# Altium PCB DAP-PCB-REV-3.2.PcbDoc (part 1 of 5)
Units mm, origin at the board's own origin, x right, y up, seen from the top; angles counter-clockwise.
Board outline 54.75 x 54.75 mm, 6 copper layers (L1 (SIG/PWR), L2 (GND), L3 (SIG), L4 (PWR), L5 (GND), L6 (SIG/PWR)), stack 1.65 mm thick; 308 components, 179 nets, 954 pads, 440 vias.
Unrouted connection lines stored in the file: 7.
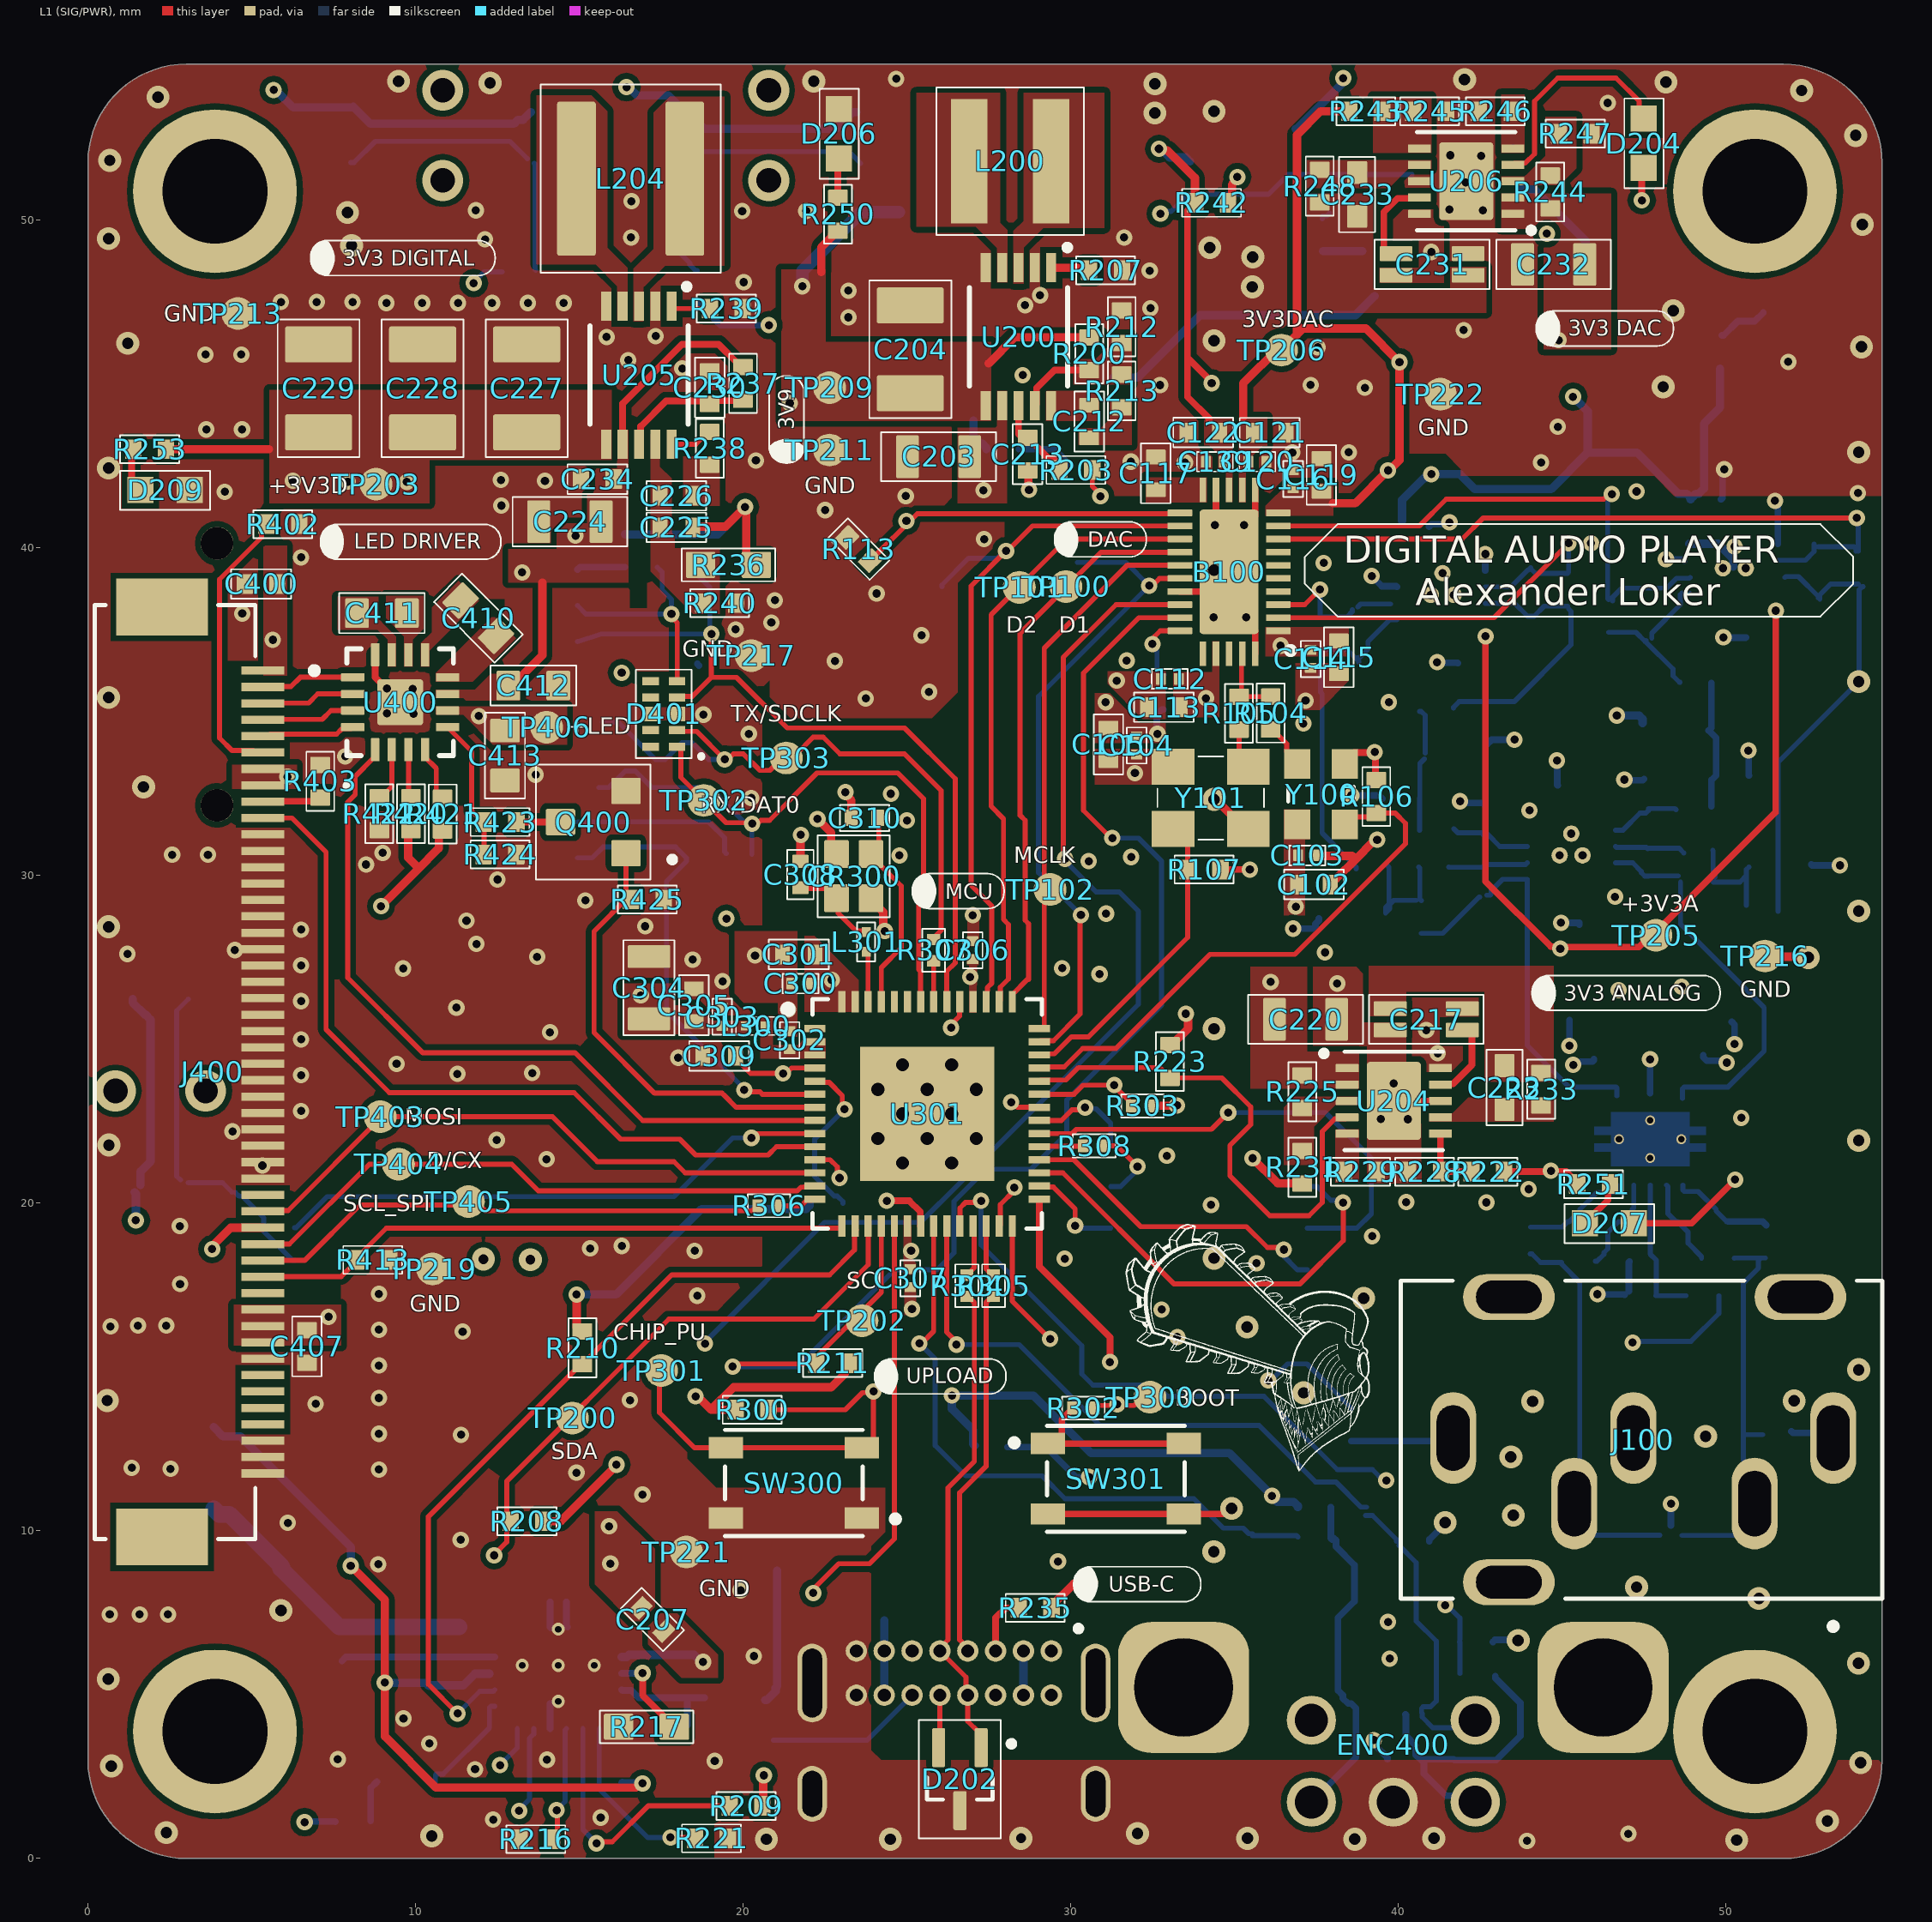
[diagram p0: L1 (SIG/PWR) view]
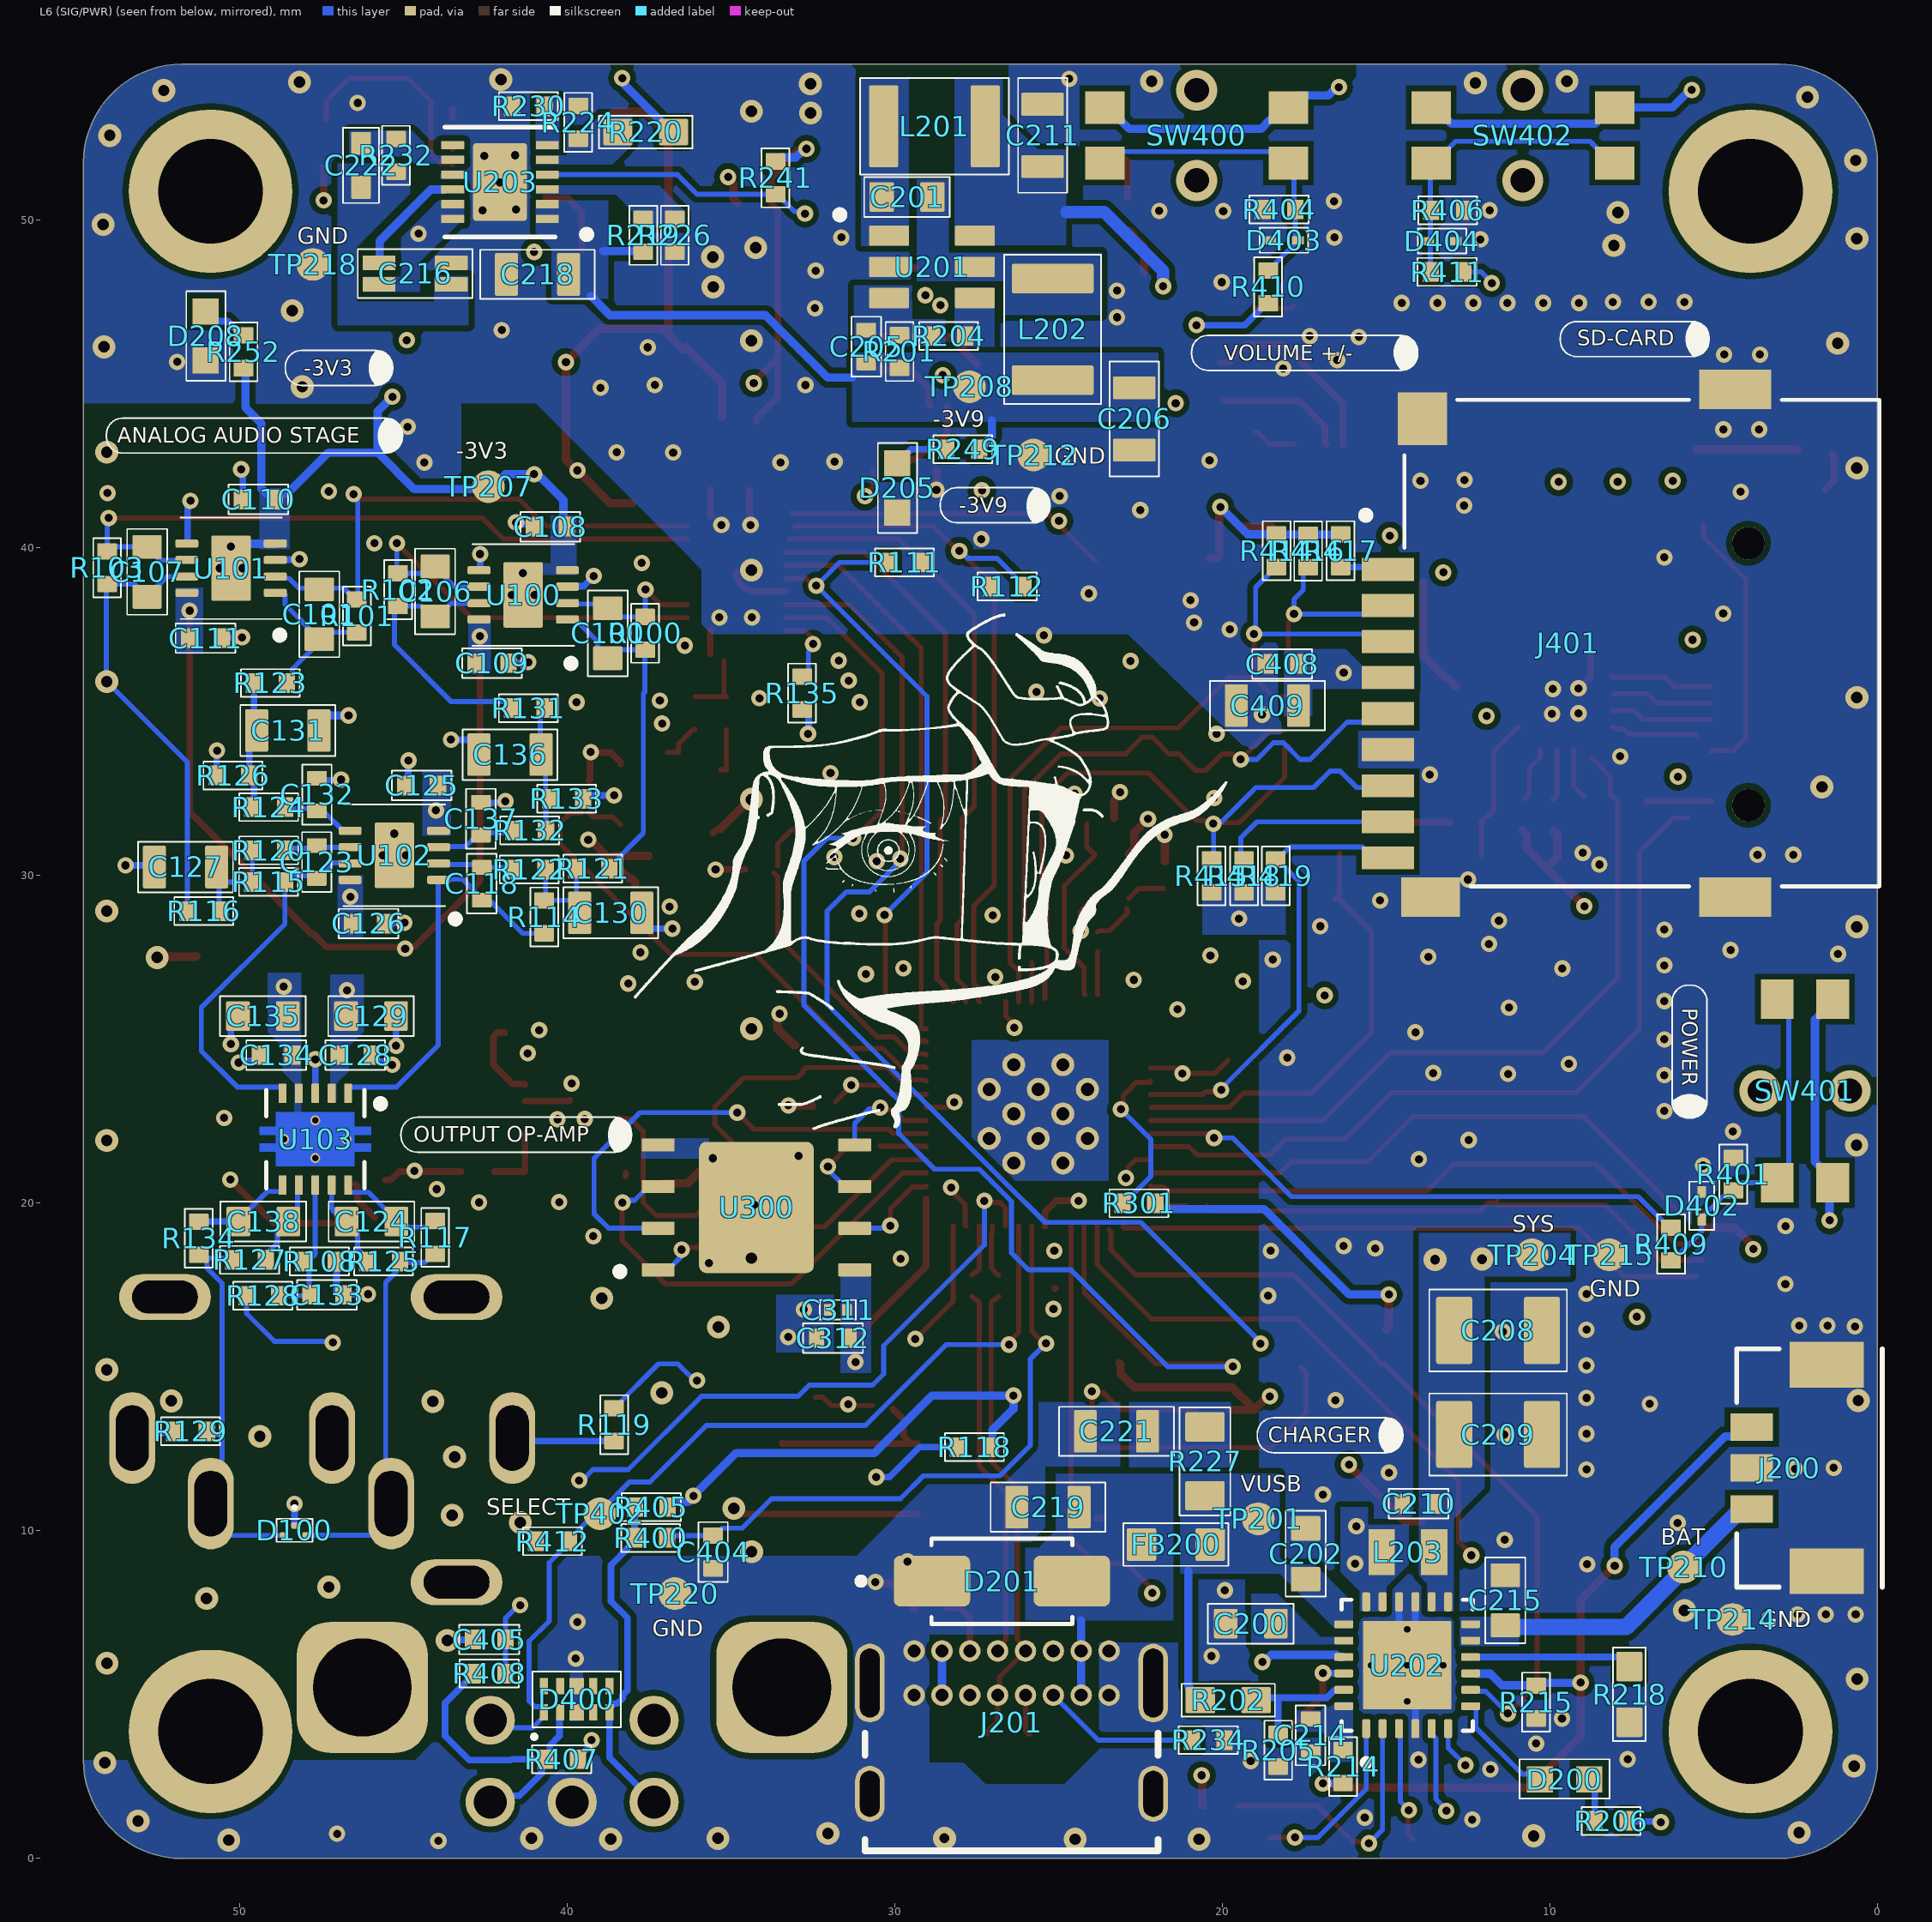
[diagram p1: L6 (SIG/PWR) view, seen from below]
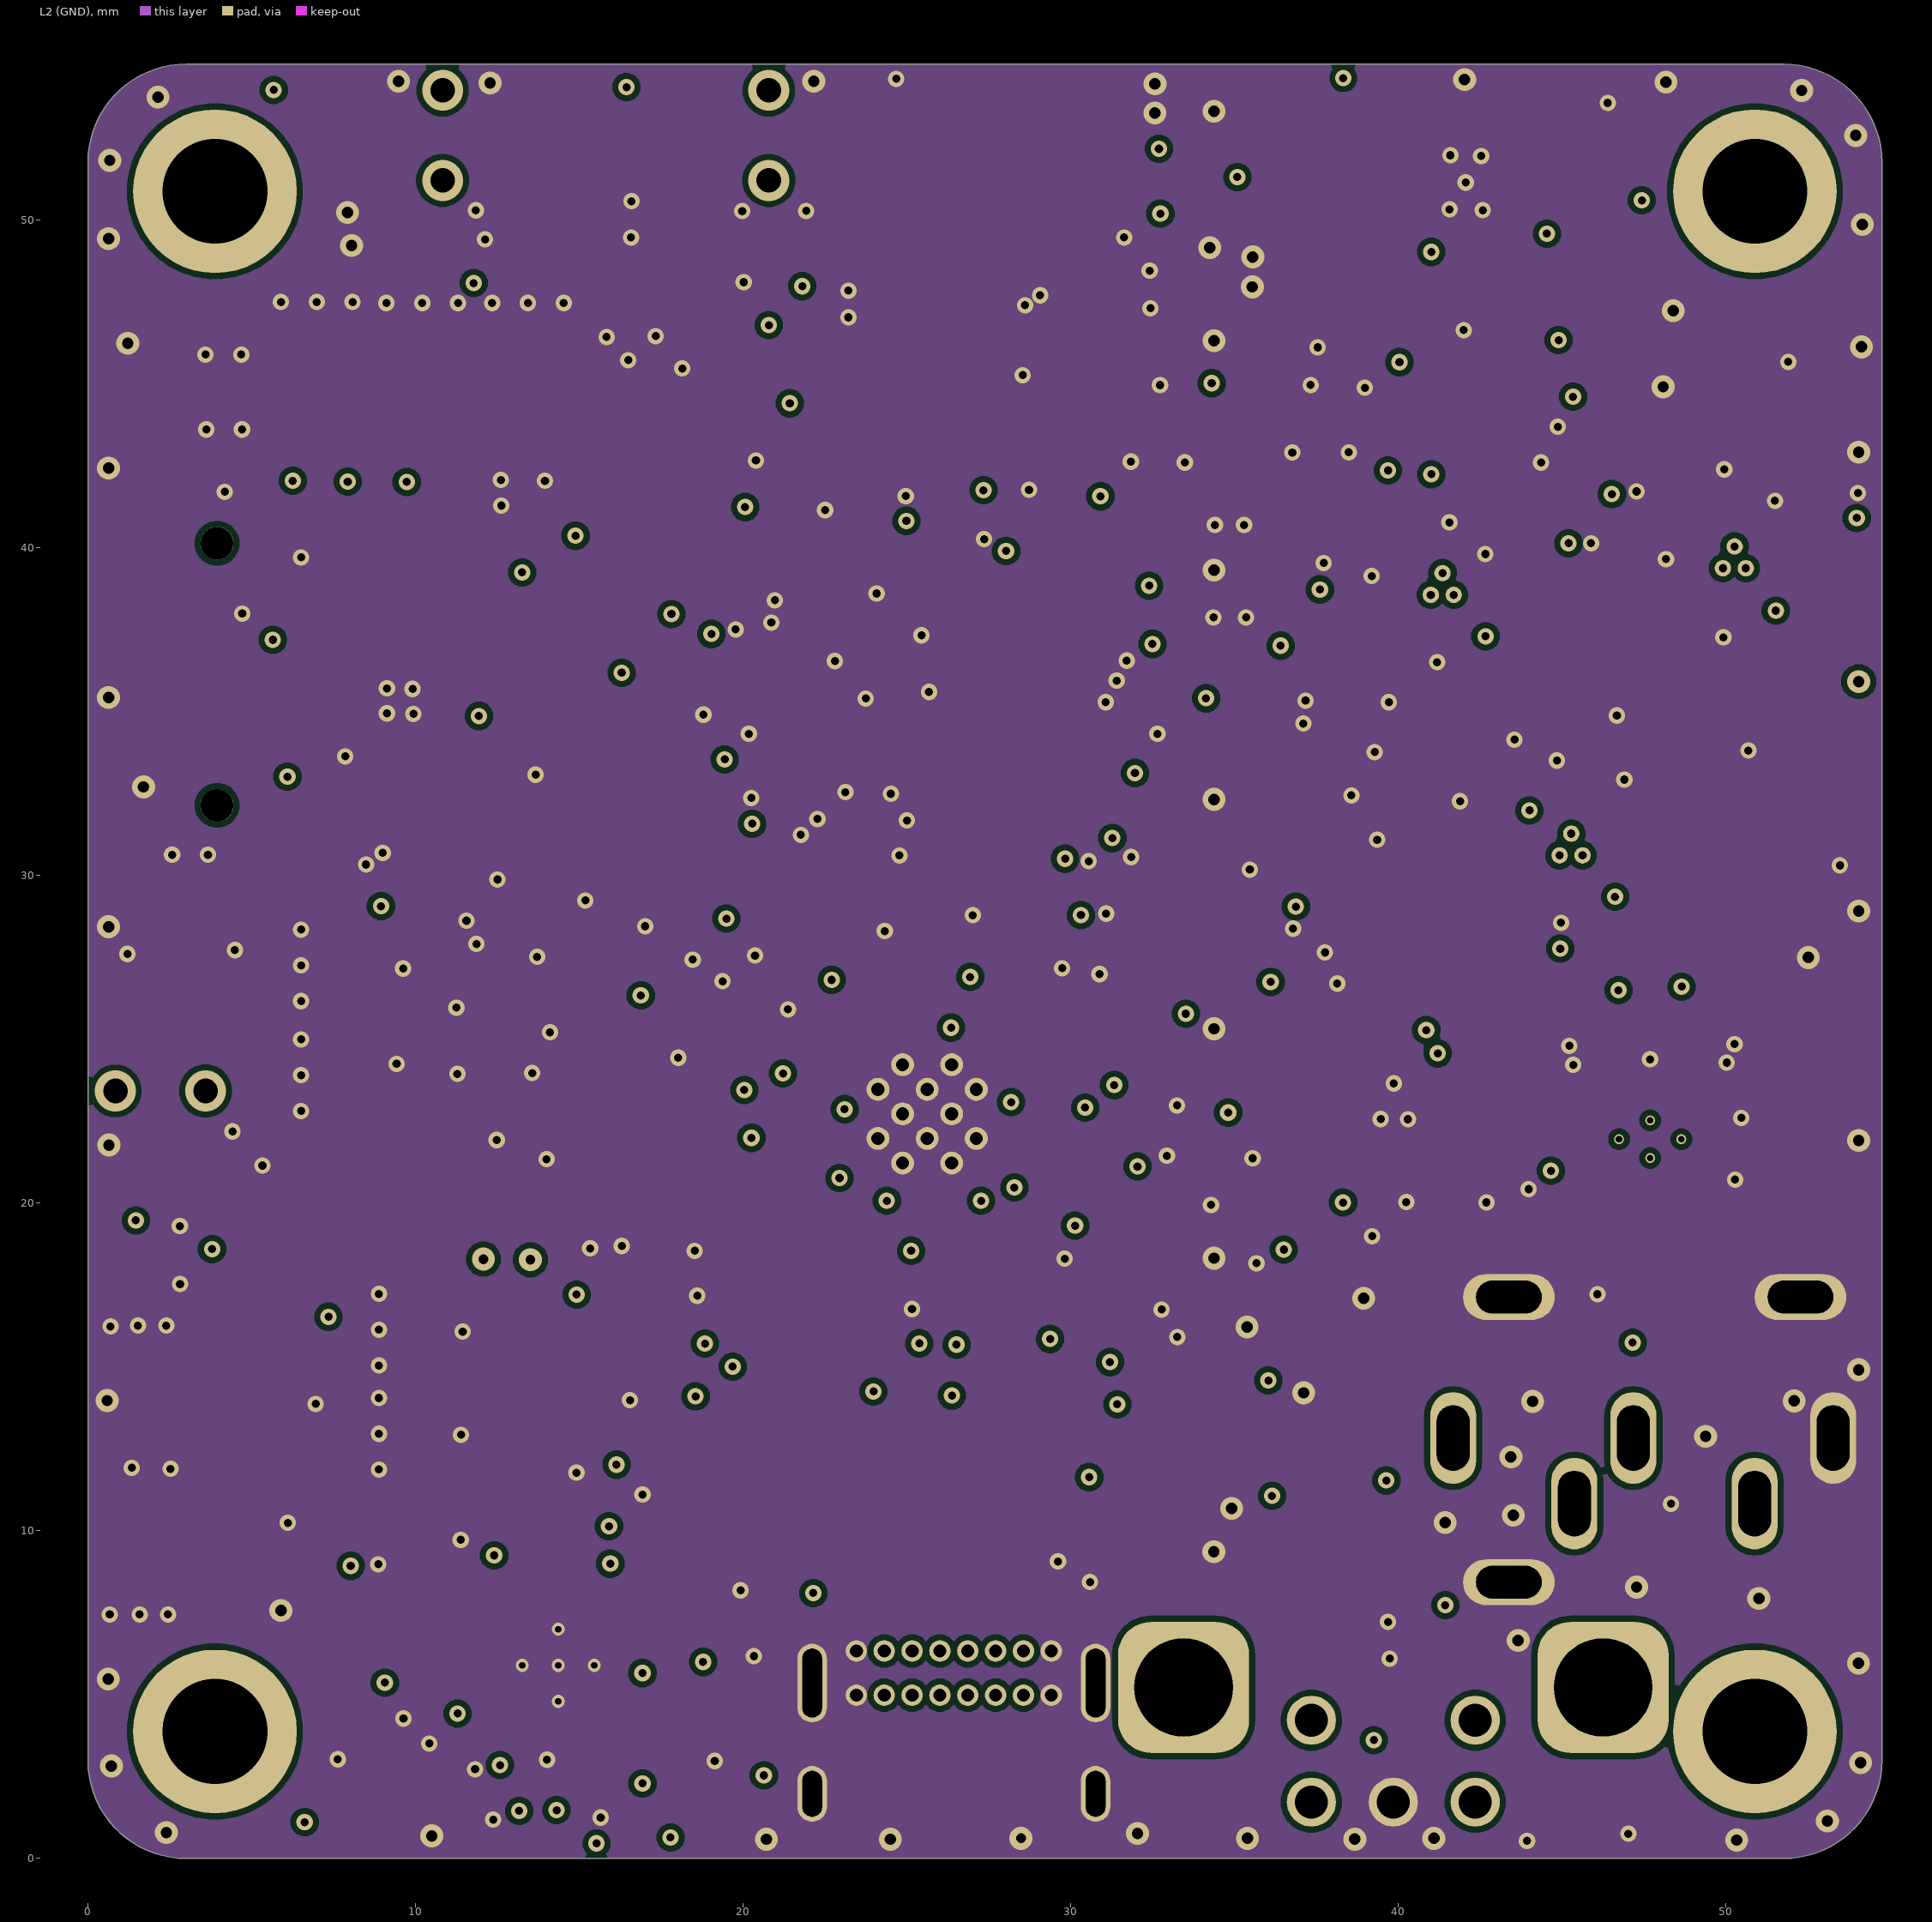
[diagram p2: L2 (GND)]
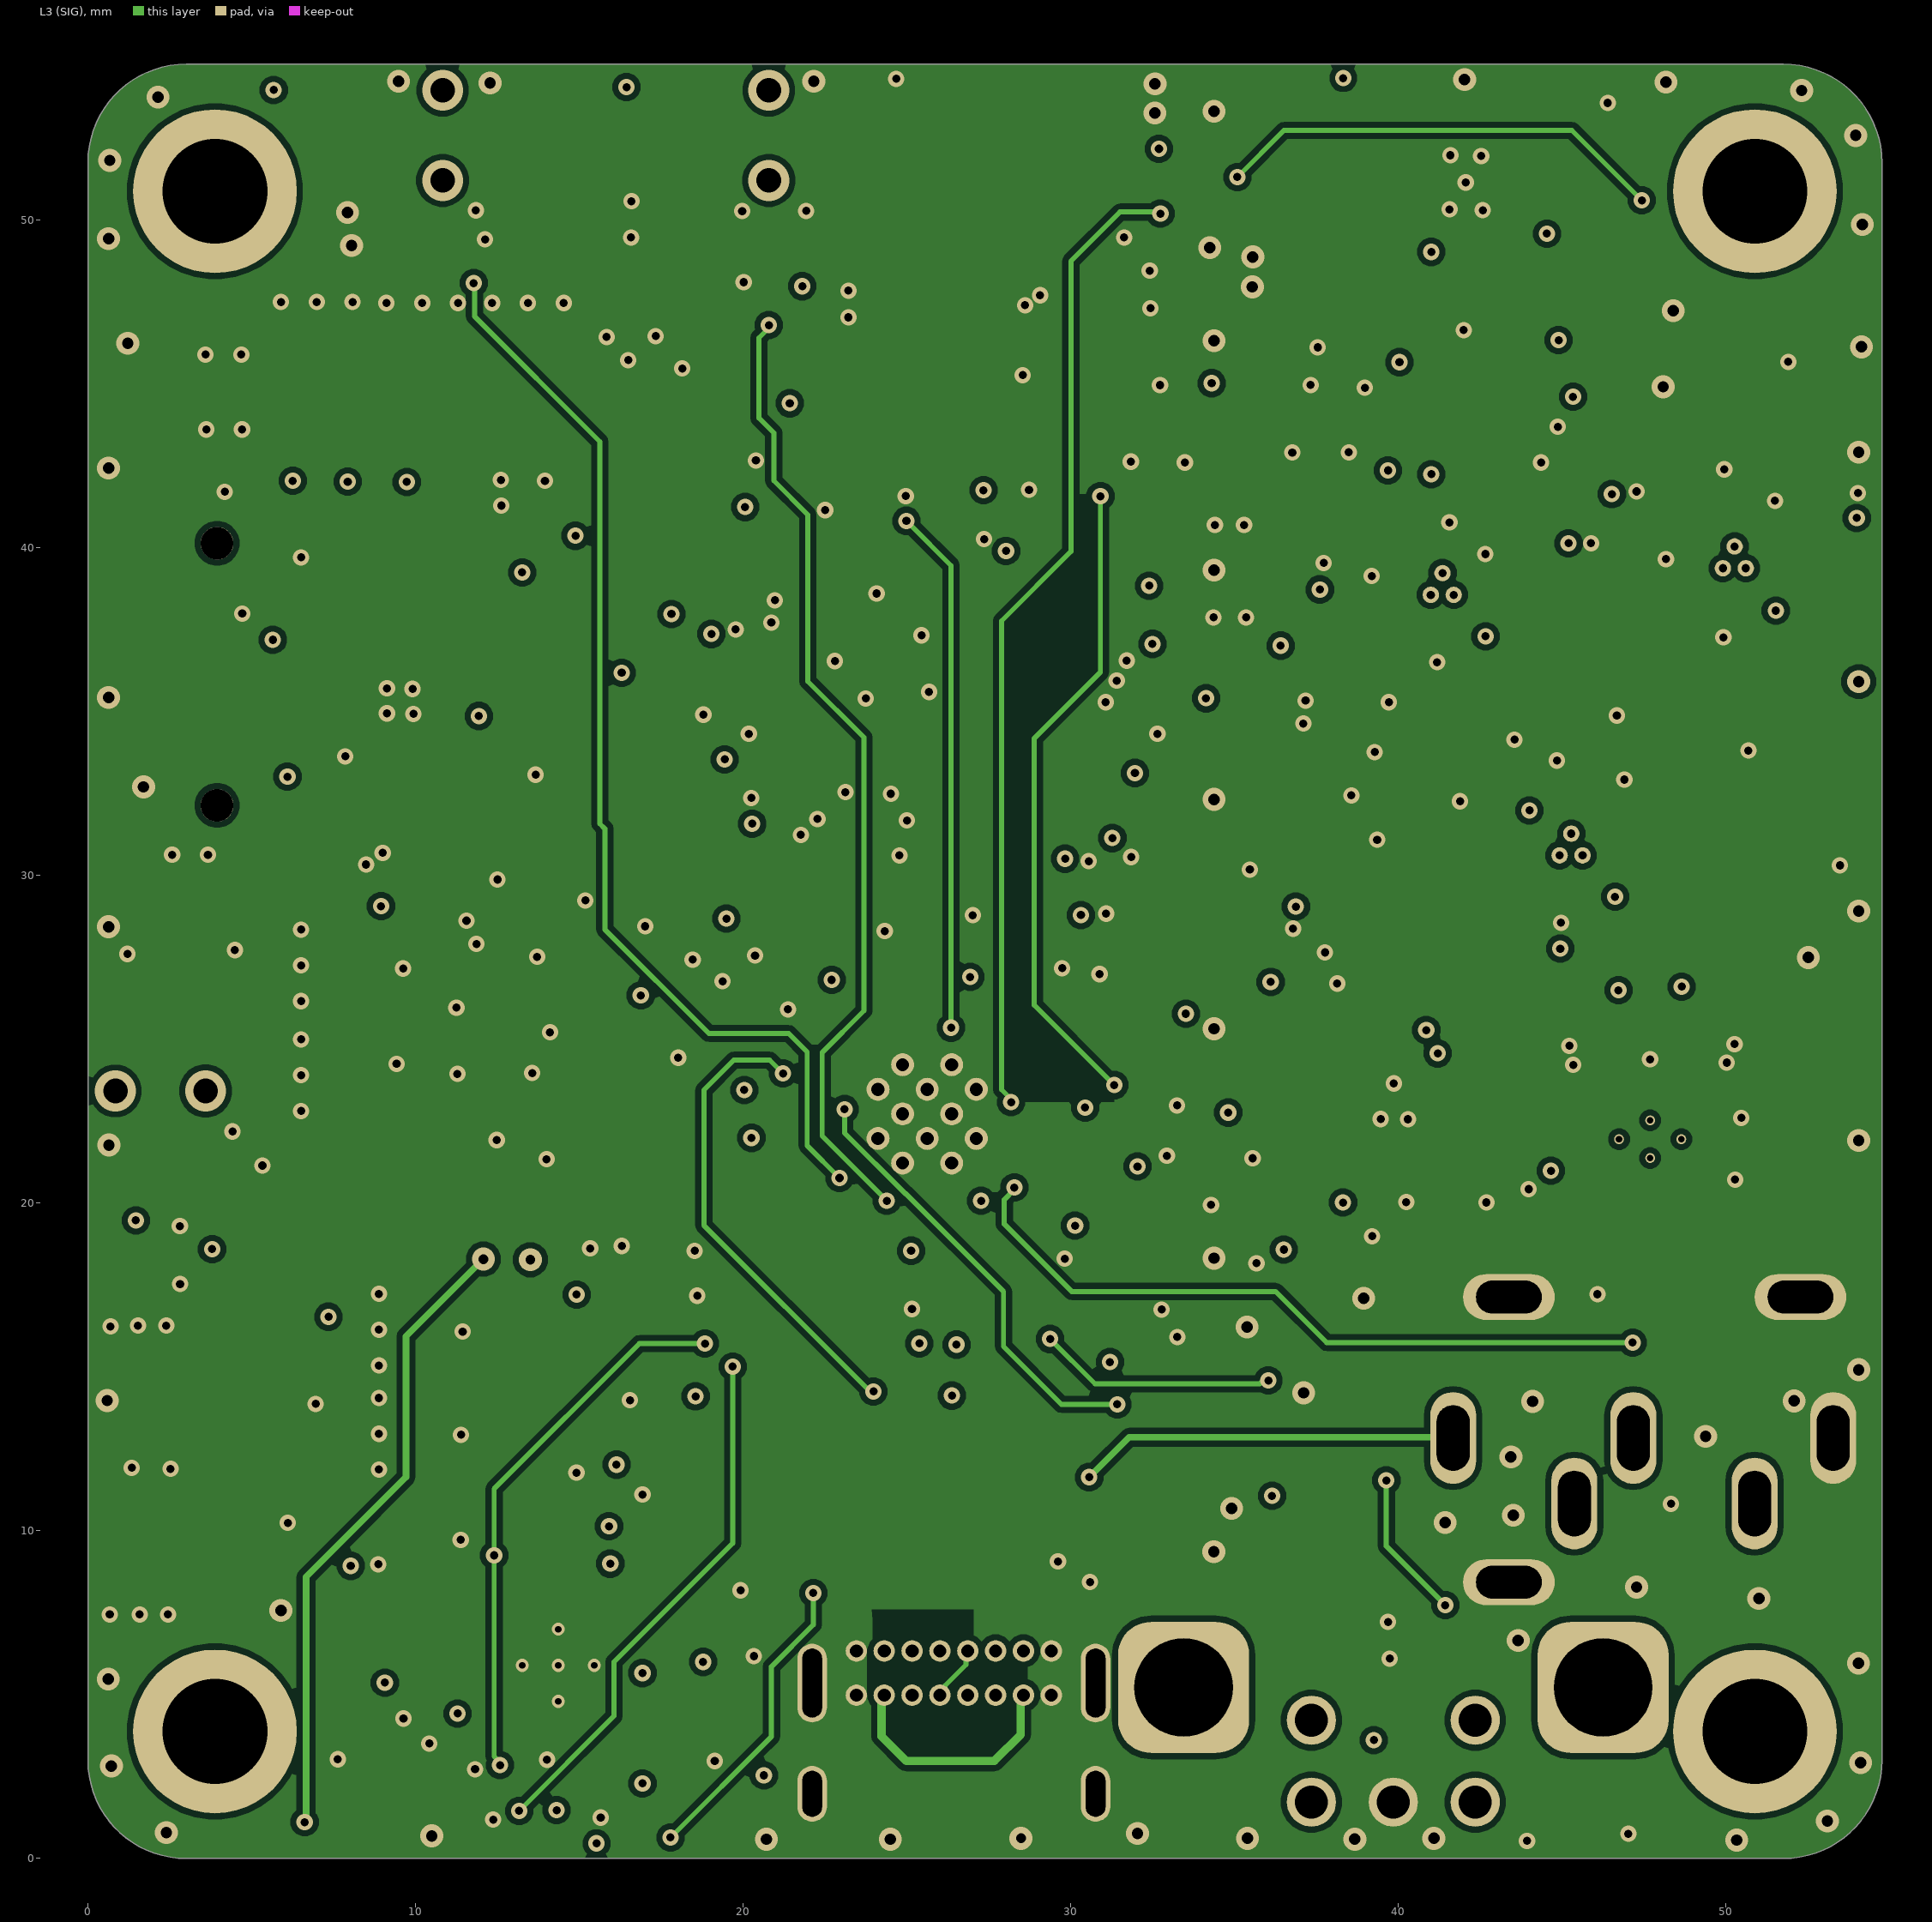
[diagram p3: L3 (SIG)]
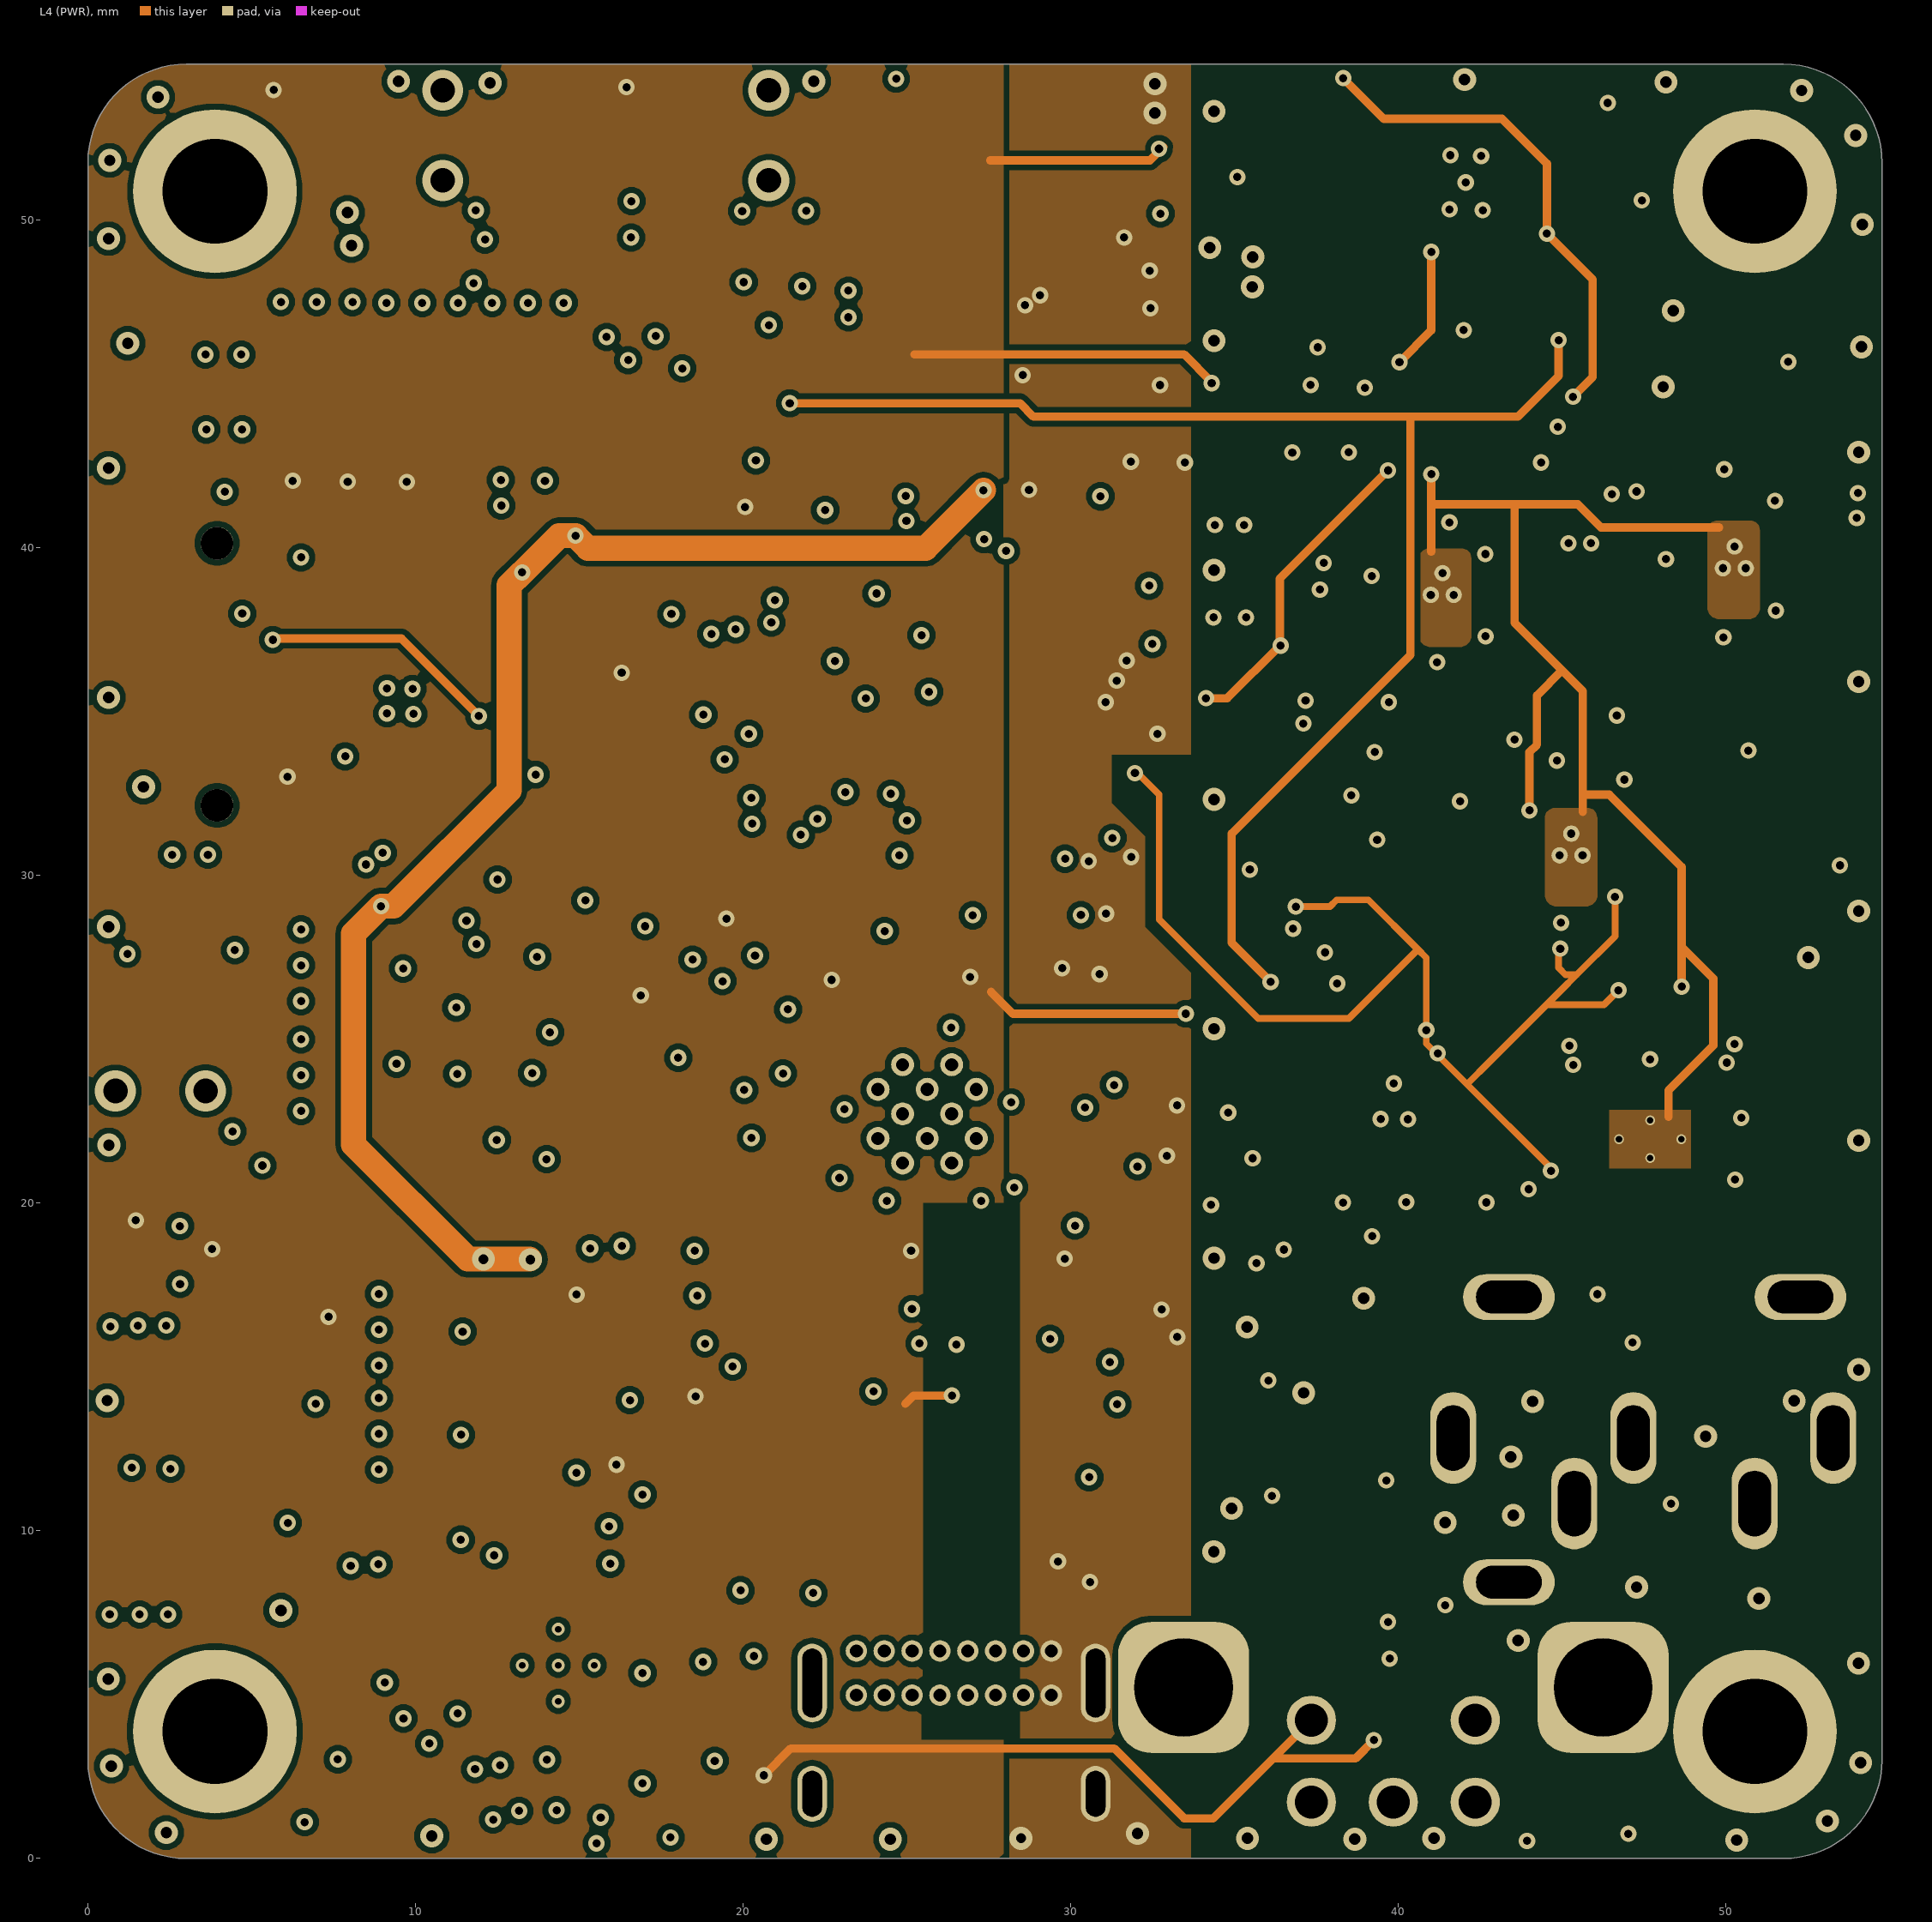
[diagram p4: L4 (PWR)]
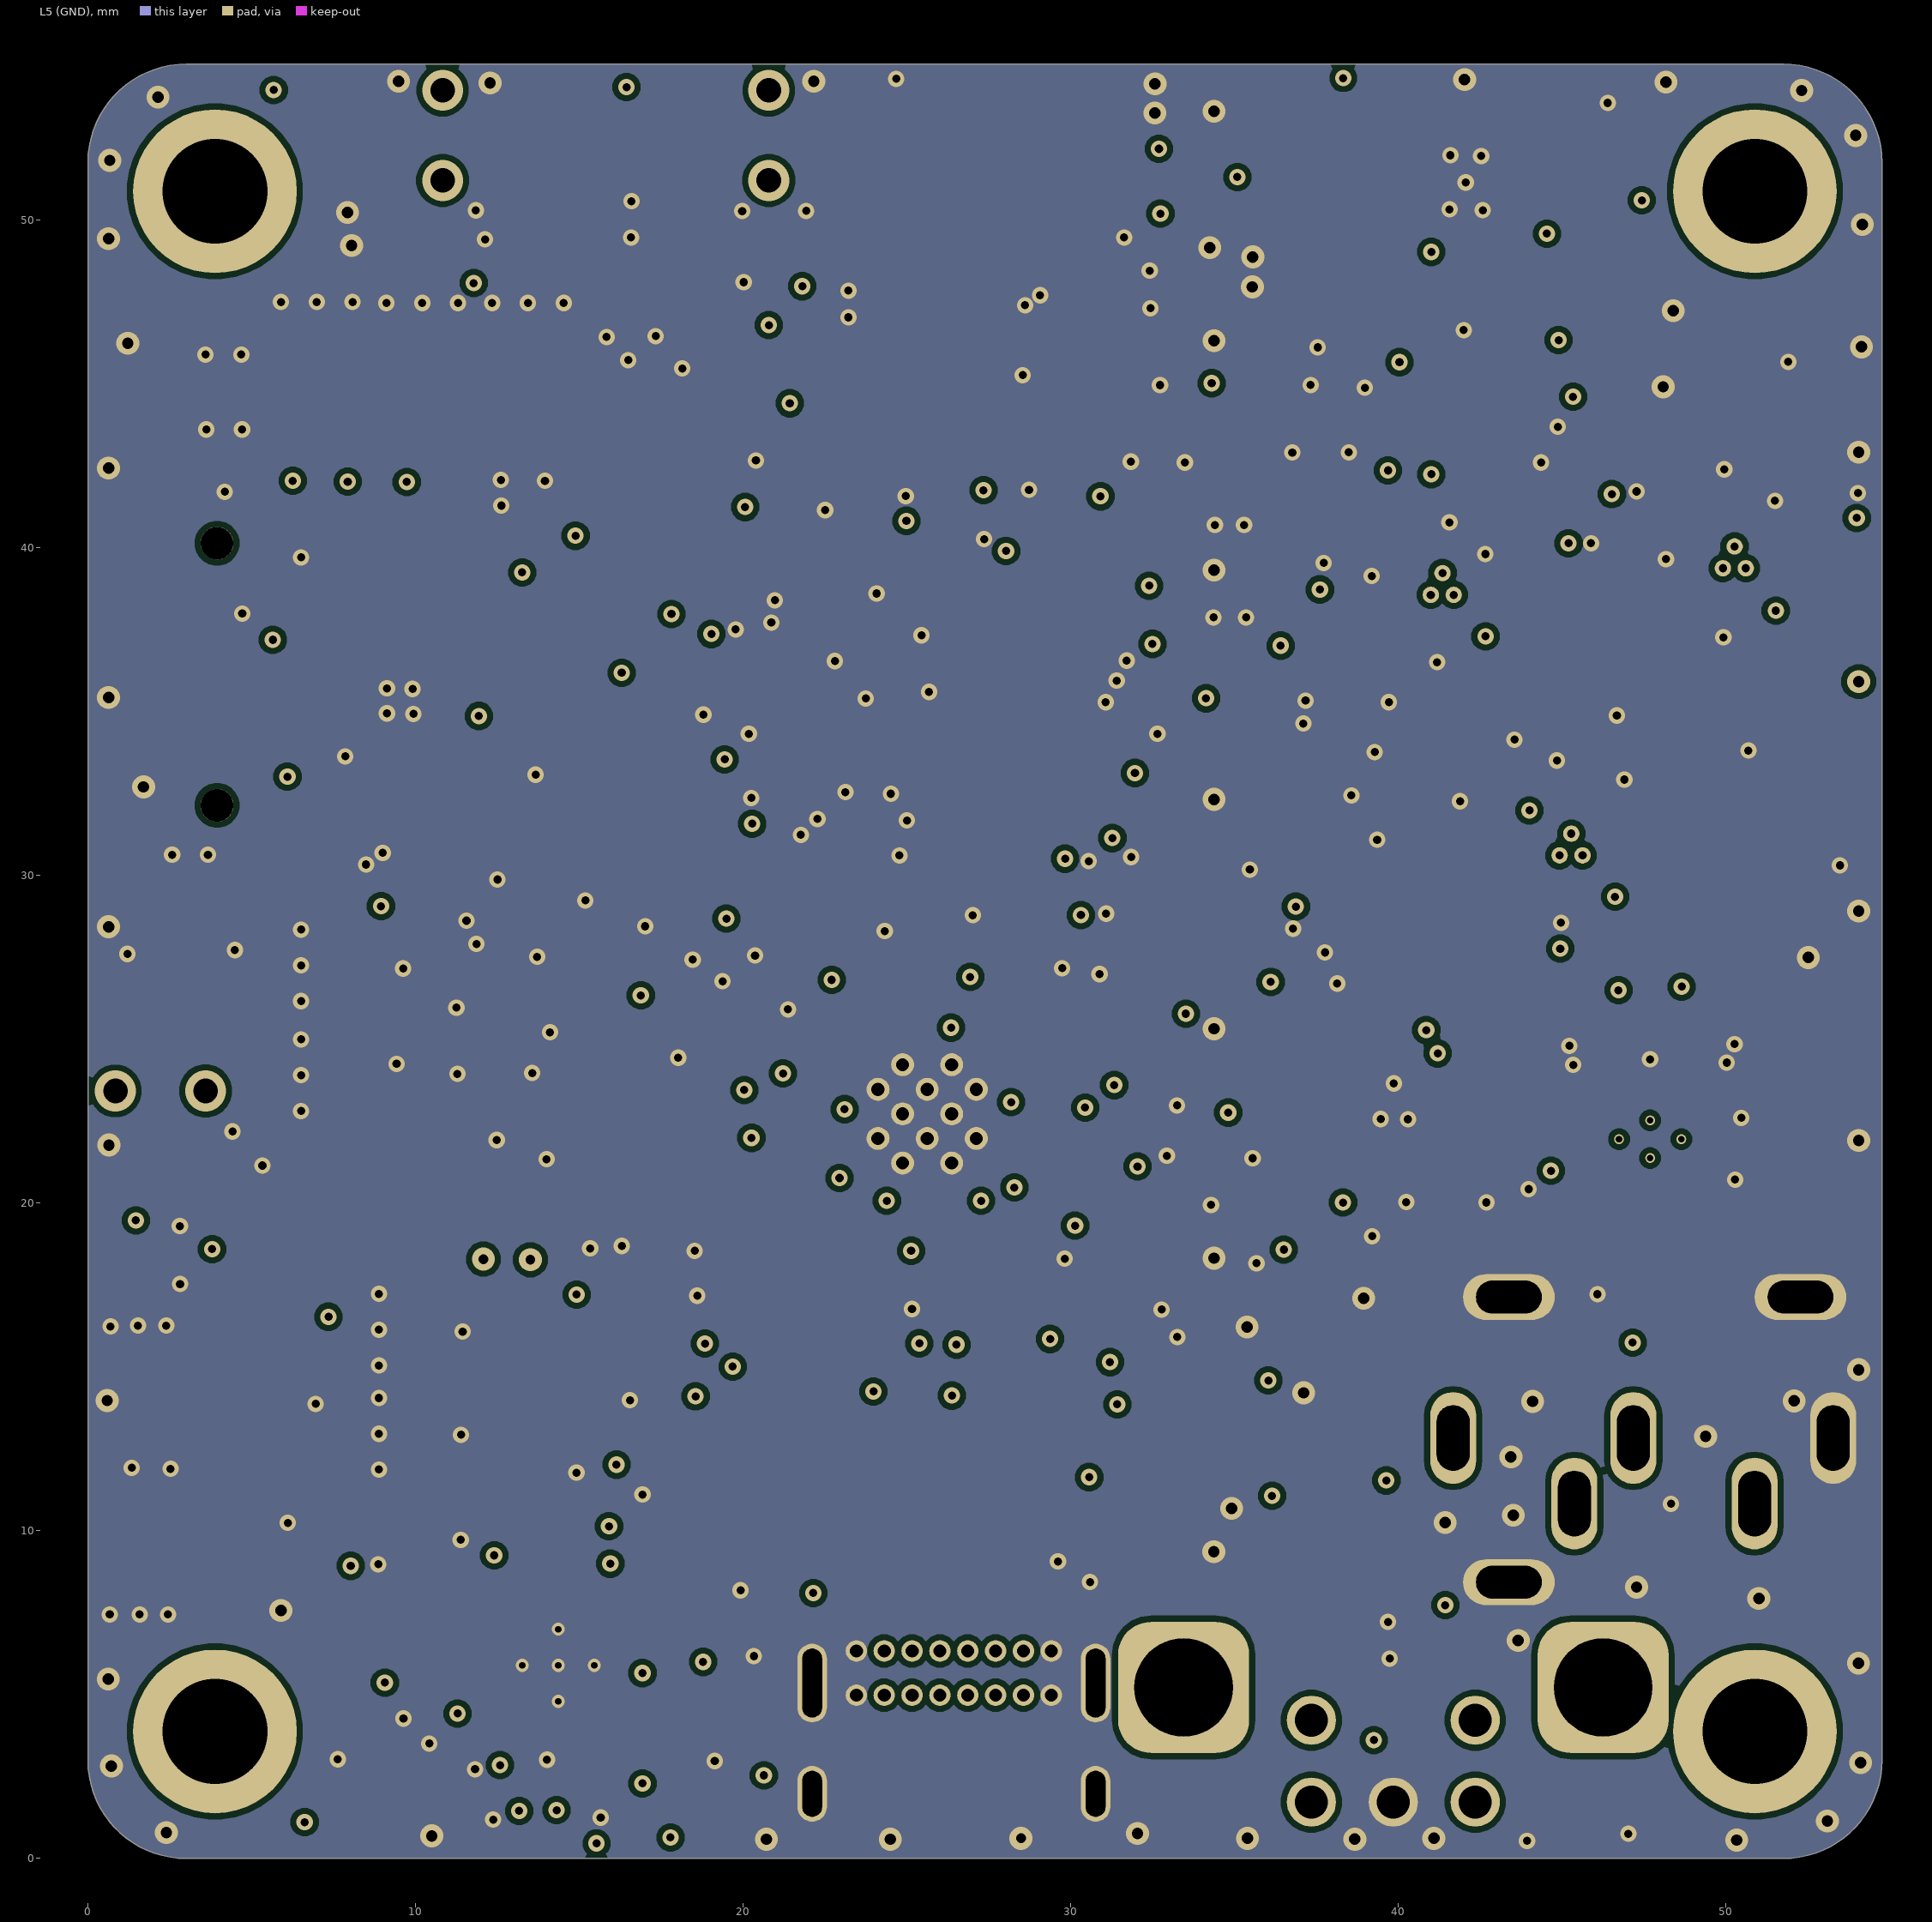
[diagram p5: L5 (GND)]

## Layer stack, top to bottom
Top Solder: solder mask 0.031, Solder Resist, Dk 4
L1 (SIG/PWR): signal copper 0.035
Dielectric 1: prepreg 0.0994, 3313, Dk 4.1
L2 (GND): signal copper 0.0152
Dielectric 8: core 0.1, Core-009, Dk 4.6
L3 (SIG): signal copper 0.0152
Dielectric 6: prepreg 0.2104, 7628, Dk 4.4
Dielectric 2: core 0.7, Core-009, Dk 4.6
Dielectric 7: prepreg 0.2104, 7628, Dk 4.4
L4 (PWR): signal copper 0.0152
Dielectric 4: core 0.1, Core-009, Dk 4.6
L5 (GND): signal copper 0.0152
Dielectric 3: prepreg 0.0994, 3313, Dk 4.1
L6 (SIG/PWR): signal copper 0.035
Bottom Solder: solder mask 0.031, Solder Resist, Dk 4

## Board outline
0,3 0,51.754 cw(c3,51.754) 3,54.754 51.754,54.754 cw(c51.754,51.754) 54.754,51.754 54.754,3 cw(c51.754,3) 51.754,0 3,0 cw(c3,3)

## Design rules (kind name [scope] priority, off if disabled: settings)
Clearance [All] p1: gap=0.178 ignorepadtopadclearanceinfootprint=FALSE except(0.12: Arc-Arc Arc-Track Track-Track; 0.127: SMDPad-SMDPad)
DiffPairsRouting [All] p1: maxlimit=0.203 minlimit=0.127 mostfreqgap=0.127 toplayer_mingap=0.203 toplayer_prefgap=0.203 toplayer_minwidth=0.153 toplayer_maxwidth=0.153 toplayer_prefwidth=0.153 midlayer1_maxgap=0.127 midlayer1_minwidth=0.082 midlayer1_maxwidth=0.082 midlayer1_prefwidth=0.082 midlayer2_maxgap=0.127 midlayer2_minwidth=0.381 midlayer2_maxwidth=0.381 midlayer2_prefwidth=0.381 midlayer3_maxgap=0.127 midlayer3_minwidth=0.101 midlayer3_maxwidth=0.101 midlayer3_prefwidth=0.101 midlayer4_maxgap=0.127 midlayer4_minwidth=0.081 midlayer4_maxwidth=0.081 midlayer4_prefwidth=0.081 bottomlayer_maxgap=0.127 bottomlayer_minwidth=0.381 bottomlayer_maxwidth=0.381 bottomlayer_prefwidth=0.381 maxuncoupledlength=12.7
HoleSize [All] p1: absolutevalues=TRUE maxlimit=5.08 minlimit=0.025 maxpercent=80.000 minpercent=20.000
MatchedLengths MatchedLengths_USB [InNetClass('USB')] p1: tolerance=0.127 checknetsindiffpair=FALSE checkdiffpairvsdiffpair=TRUE checkxsignals=TRUE checkothers=TRUE
MatchedLengths [InNetClass('SD-Card')] p2 off: tolerance=0.508 checknetsindiffpair=FALSE checkdiffpairvsdiffpair=TRUE checkxsignals=TRUE checkothers=TRUE
MinimumSolderMaskSliver [All] p1: minsoldermaskwidth=0.08
PlaneConnect [All] p1: planeconnectstyle=Direct reliefexpansion=0.508 reliefentries=4 reliefconductorwidth=0.254 reliefairgap=0.254
PolygonConnect Thermal_Relief [D207] p1: connectstyle=Relief reliefconductorwidth=0.254 reliefentries=4 polygonreliefangle="90 Angle" airgapwidth=0.254
PolygonConnect [All] p2: connectstyle=Direct reliefconductorwidth=0.254 reliefentries=4 polygonreliefangle="90 Angle" airgapwidth=0.254
RoutingVias [All] p1: holewidth=0.711 width=1.27 viastyle="Through Hole" minholewidth=0.711 minwidth=1.27 maxholewidth=0.711 maxwidth=1.27
SilkToSilkClearance [All] p1: silktosilkclearance=0.102
SilkToSolderMaskClearance [IsPad] p1: minsilkscreentomaskgap=0.075 clearancetoexposedcopper=TRUE
SolderMaskExpansion [All] p1: expansion=0.102 istentingtop=FALSE
SupplyNets "Schematic Supply Nets_2" [InNet('+3V3_DIG')] p1: voltage=0.000
SupplyNets "Schematic Supply Nets_4" [InNet('-3V3')] p2: voltage=0.000
SupplyNets "Schematic Supply Nets_3" [InNet('+3V3_DAC')] p3: voltage=0.000
SupplyNets "Schematic Supply Nets" [InNet('+3V3_ANALOG')] p4: voltage=0.000
SupplyNets "Schematic Supply Nets_14" [InNet('-3V9')] p5: voltage=0.000
SupplyNets "Schematic Supply Nets_13" [InNet('VUSB')] p6: voltage=0.000
SupplyNets "Schematic Supply Nets_12" [InNet('+3V9')] p7: voltage=0.000
SupplyNets "Schematic Supply Nets_11" [InNet('SYS')] p8: voltage=0.000
SupplyNets "Schematic Supply Nets_10" [InNet('GND')] p9: voltage=0.000
SupplyNets "Schematic Supply Nets_7" [InNet('VDD_SPI')] p10: voltage=0.000
SupplyNets "Schematic Supply Nets_1" [InNet('+LED')] p11: voltage=0.000
Width Width_SDIO [InNet('DAT0_SD')] p1: maxlimit=0.254 minlimit=0.075 preferedwidth=0.254 toplayer_minwidth=0.153 toplayer_maxwidth=0.153 toplayer_prefwidth=0.153 midlayer1_minwidth=0.076 midlayer1_maxwidth=0.076 midlayer1_prefwidth=0.076 midlayer3_minwidth=0.124 midlayer3_maxwidth=0.124 midlayer3_prefwidth=0.124 midlayer4_maxwidth=0.075 midlayer4_prefwidth=0.075 impedanceprofiledriven=TRUE impedanceprofileid={48430726-4F48-4365-8BCE-9E489C11A382} impedanceprofilevalue=50.000000 minimp=50.000000 maximp=50.000000 favimp=50.000000
Width [All] p2: maxlimit=2.54 minlimit=0.152 preferedwidth=0.203 toplayer_minwidth=0.152 toplayer_prefwidth=0.203 minimp=50.000000 maximp=50.000000 favimp=50.000000
24 further rules are at their usual default settings.

## Classes and differential pairs
component class DAP-Power-2: C200 C201 C202 C203 C204 C205 C206 C207 C208 C209 C210 C211 C212 C213 C214 C215 C216 C217 C218 C219 C220 C221 C222 C223 C224 C225 C226 C227 C228 C229 C230 C231 C232 C233 C234 D200 D201 D202 D204 D205 D206 D207 D208 D209 FB200 J200 J201 L200 L201 L202 L203 L204 R200 R201 R202 R203 R204 R205 R206 R207 R208 R209 R210 R211 R212 R213 R214 R215 R216 R217 R218 R219 R220 R221 R222 R223 R224 R225 R226 R227 R228 R229 R230 R231 R232 R233 R234 R235 R236 R237 R238 R239 R240 R241 R242 R243 R244 R245 R246 R247 R248 R249 R250 R251 R252 R253 TP200 TP201 TP202 TP203 TP204 TP205 TP206 TP207 TP208 TP209 TP210 TP211 TP212 TP213 TP214 TP215 TP216 TP217 TP218 TP219 TP220 TP221 TP222 U200 U201 U202 U203 U204 U205 U206
component class DAP-Peripherals-4: C400 C404 C405 C407 C408 C409 C410 C411 C412 C413 D400 D401 D402 D403 D404 ENC400 J400 J401 Q400 R400 R401 R402 R403 R404 R405 R406 R407 R408 R409 R410 R411 R412 R413 R414 R415 R416 R417 R418 R419 R420 R421 R422 R423 R424 R425 SW400 SW401 SW402 TP402 TP403 TP404 TP405 TP406 U400
component class DAP-MCU-3: C300 C301 C302 C303 C304 C305 C306 C307 C308 C309 C310 C311 C312 CR300 L300 L301 R300 R301 R302 R303 R304 R305 R306 R307 R308 SW300 SW301 TP300 TP301 TP302 TP303 U300 U301
component class DAP-Audio-1: B100 C100 C101 C102 C103 C104 C105 C106 C107 C108 C109 C110 C111 C112 C113 C114 C115 C116 C117 C118 C119 C120 C121 C122 C123 C124 C125 C126 C127 C128 C129 C130 C131 C132 C133 C134 C135 C136 C137 C138 C139 D100 J100 R100 R101 R102 R103 R104 R105 R106 R107 R108 R111 R112 R113 R114 R115 R116 R117 R118 R119 R120 R121 R122 R123 R124 R125 R126 R127 R128 R129 R131 R132 R133 R134 R135 TP100 TP101 TP102 U100 U101 U102 U103 Y100 Y101
differential pair USB_D: +USB_D_P -USB_D_N

## Components (designator, comment, footprint, x,y, rotation, side; value= is the part's Value field where it differs from the comment)
B100 "DAC Audiophile" QFN40P300X500X80-31N-D 34.829,39.263 r180 top
C100 "CAP CER 1500PF 50V C0G/NP0 0603" CAP_GCM/R18 38.755,37.389 r270 bottom
C101 "CAP CER 1500PF 50V C0G/NP0 0603" CAP_GCM/R18 47.556,37.967 r270 bottom
C102 "CAP CER 1UF 25V X5R 0402" CAP_GRM15 37.418,29.722 r180 top
C103 "CAP CER 0.1UF 25V X5R 0201" CAP_GRM03 37.215,30.611 r180 top
C104 "CAP CER 0.1UF 25V X5R 0201" CAP_GRM03 32.008,33.964 r270 top
C105 "CAP CER 1UF 25V X5R 0402" CAP_GRM15 31.144,33.997 r270 top
C106 "CAP CER 1500PF 50V C0G/NP0 0603" CAP_GCM/R18 44.022,38.663 r270 bottom
C107 "CAP CER 1500PF 50V C0G/NP0 0603" CAP_GCM/R18 52.814,39.263 r270 bottom
C108 "CAP CER 0.1UF 50V X7R 0402" CAP_GCM/R15 40.507,40.641 r180 bottom
C109 "CAP CER 0.1UF 50V X7R 0402" CAP_GCM/R15 42.285,36.475 r0 bottom
C110 "CAP CER 0.1UF 50V X7R 0402" CAP_GCM/R15 49.417,41.473 r180 bottom
C111 "CAP CER 0.1UF 50V X7R 0402" CAP_GCM/R15 51.033,37.24 r0 bottom
C112 "CAP CER 0.1UF 25V X5R 0201" CAP_GRM03 33.02,35.996 r0 top
C113 "CAP CER 1UF 25V X5R 0402" CAP_GRM15 32.838,35.132 r0 top
C114 "CAP CER 0.1UF 25V X5R 0201" CAP_GRM03 37.317,36.605 r90 top
C115 "CAP CER 1UF 25V X5R 0402" CAP_GRM15 38.18,36.656 r90 top
C116 "CAP CER 0.1UF 25V X5R 0201" CAP_GRM03 36.783,42.092 r270 top
C117 "CAP CER 4.7UF 6.3V X5R 0402" CAP_GRM15 32.592,42.27 r270 top
C118 "CAP CER 2700PF 50V C0G/NP0 0402" CAP_GRM15 42.6,29.747 r90 bottom
C119 "CAP CER 1UF 25V X5R 0402" CAP_GRM15 37.647,42.219 r270 top
C120 "CAP CER 0.1UF 25V X5R 0201" CAP_GRM03 35.691,42.625 r180 top
C121 "CAP CER 1UF 25V X5R 0402" CAP_GRM15 36.068,43.51 r180 top
C122 "CAP CER 1UF 25V X5R 0402" CAP_GRM15 34.04,43.514 r0 top
C123 "CAP CER 2700PF 50V C0G/NP0 0402" CAP_GRM15 47.635,30.408 r90 bottom
C124 "CAP CER 1500PF 50V C0G/NP0 0603" CAP_GCM/R18 45.964,19.435 r0 bottom
C125 "CAP CER 0.1UF 50V X7R 0402" CAP_GCM/R15 44.435,32.745 r180 bottom
C126 "CAP CER 0.1UF 50V X7R 0402" CAP_GCM/R15 46.054,28.528 r0 bottom
C127 "CAP CER 0.013UF 50V C0G/NP0 0805" CAP_GCM/R21 51.642,30.255 r180 bottom
C128 "CAP CER 0.1UF 50V X7R 0402" CAP_GCM/R15 46.461,24.515 r0 bottom
C129 "CAP CER 1UF 25V X7R 0603" CAP_GCM/R18 45.978,25.709 r180 bottom
C130 "CAP CER 0.013UF 50V C0G/NP0 0805" CAP_GCM/R21 38.663,28.858 r0 bottom
C131 "CAP CER 0.013UF 50V C0G/NP0 0805" CAP_GCM/R21 48.518,34.421 r0 bottom
C132 "CAP CER 2700PF 50V C0G/NP0 0402" CAP_GRM15 47.63,32.465 r90 bottom
C133 "CAP CER 0.1UF 50V X7R 0402" CAP_GCM/R15 47.324,17.2 r0 bottom
C134 "CAP CER 0.1UF 50V X7R 0402" CAP_GCM/R15 48.874,24.515 r180 bottom
C135 "CAP CER 1UF 25V X7R 0603" CAP_GCM/R18 49.28,25.709 r0 bottom
C136 "CAP CER 0.013UF 50V C0G/NP0 0805" CAP_GCM/R21 41.736,33.684 r180 bottom
C137 "CAP CER 2700PF 50V C0G/NP0 0402" CAP_GRM15 42.625,31.729 r90 bottom
C138 "CAP CER 1500PF 50V C0G/NP0 0603" CAP_GCM/R18 49.266,19.435 r180 bottom
C139 "CAP CER 0.1UF 25V X5R 0201" CAP_GRM03 34.396,42.625 r0 top
C200 "CAP CER 1UF 25V X7R 0603" CAP_GCM/R18 19.13,7.167 r0 bottom
C201 "CAP CER 2.2UF 25V X7R 0603" CAP_GRM18 29.62,50.702 r180 bottom
C202 "CAP CER 2.2UF 25V X7R 0603" CAP_GRM18 17.454,9.3 r90 bottom
C203 "CAP CER 10UF 10V X7R 0805" CAP_GCM/R21 25.963,42.778 r0 top
C204 "CAP CER 22UF 25V X7S 1210" CAP_GCM/R32 25.099,46.054 r270 top
C205 "CAP CER 22PF 50V C0G/NP0 0402" CAP_GRM15 30.865,46.137 r270 bottom
C206 "CAP CER 10UF 10V X7R 0805" CAP_GCM/R21 22.686,43.93 r90 bottom
C207 "CAP CER 0.033UF 16V X7R 0402" CAP_GRM15 17.225,7.294 r315 top
C208 "CAP CER 22UF 25V X7S 1210" CAP_GCM/R32 11.58,16.114 r0 bottom
C209 "CAP CER 22UF 25V X7S 1210" CAP_GCM/R32 11.58,12.939 r0 bottom
C210 "CAP CER 0.1UF 50V X7R 0402" CAP_GRM15 14.006,10.824 r180 bottom
C211 "CAP CER 10UF 10V X7R 0805" CAP_GCM/R21 25.48,52.582 r270 bottom
C212 "CAP CER 1500PF 50V C0G/NP0 0402" CAP_GRM15 30.56,43.851 r90 top
C213 "CAP CER 0.1UF 50V X7R 0402" CAP_GCM/R15 28.681,42.854 r90 top
C214 "CAP CER 1UF 35V X5R 0402" CAP_GRM15 17.301,3.756 r90 bottom
C215 "CAP CER 1UF 25V X7R 0603" CAP_GCM/R18 11.358,7.878 r90 bottom
C216 "CAP CER 10UF 10V X7R 0805" "CAPC2012X140N - CUT" 44.632,48.366 r0 bottom
C217 "CAP CER 10UF 10V X7R 0805" "CAPC2012X140N - CUT" 40.847,25.607 r0 top
C218 "CAP CER 10UF 10V X7R 0805" CAP_GCM/R21 40.898,48.34 r180 bottom
C219 "CAP CER 4.7UF 16V X7R 0805" CAP_GCM/R21 25.318,10.723 r180 bottom
C220 "CAP CER 10UF 10V X7R 0805" CAP_GCM/R21 37.164,25.607 r180 top
C221 "CAP CER 4.7UF 16V X7R 0805" CAP_GCM/R21 23.227,13.034 r180 bottom
C222 "CAP TANT 2.2UF 20% 16V 0603" CAP_298D225X0016M2T 46.283,51.668 r90 bottom
C223 "CAP TANT 2.2UF 20% 16V 0603" CAP_298D225X0016M2T 43.235,23.524 r90 top
C224 "CAP CER 10UF 10V X7R 0805" CAP_GCM/R21 14.711,40.796 r0 top
C225 "CAP CER 100PF 50V C0G/NP0 0402" CAP_GRM15 17.962,40.619 r0 top
C226 "CAP CER 1500PF 50V C0G/NP0 0402" CAP_GRM15 17.962,41.584 r0 top
C227 "CAP CER 22UF 25V X7S 1210" CAP_GCM/R32 13.39,44.86 r270 top
C228 "CAP CER 22UF 25V X7S 1210" CAP_GCM/R32 10.215,44.86 r270 top
C229 "CAP CER 22UF 25V X7S 1210" CAP_GCM/R32 7.04,44.86 r270 top
C230 "CAP CER 0.1UF 50V X7R 0402" CAP_GCM/R15 18.978,44.886 r270 top
C231 "CAP CER 10UF 10V X7R 0805" "CAPC2012X140N - CUT" 41.025,48.645 r180 top
C232 "CAP CER 10UF 10V X7R 0805" CAP_GCM/R21 44.733,48.645 r0 top
C233 "CAP TANT 2.2UF 20% 16V 0603" CAP_298D225X0016M2T 38.739,50.779 r270 top
C234 "CAP CER 0.1UF 50V X7R 0402" CAP_GCM/R15 15.549,42.092 r0 top
C300 "CAP CER 10000PF 10V X7R 0201" CAP_GRM03 21.746,26.699 r0 top
C301 "CAP CER 1UF 25V X5R 0402" CAP_GRM15 21.696,27.588 r0 top
C302 "CAP CER 0.1UF 25V X5R 0201" CAP_GRM03 21.416,24.972 r270 top
C303 "CAP CER 0.1UF 25V X5R 0201" CAP_GRM03 19.359,25.683 r270 top
C304 "CAP CER 10UF 10V X7R 0805" CAP_GCM/R21 17.124,26.572 r270 top
C305 "CAP CER 1UF 25V X5R 0402" CAP_GRM15 18.495,26.039 r270 top
C306 "CAP CER 0.1UF 25V X5R 0201" CAP_GRM03 27.004,27.715 r270 top
C307 "CAP CER 0.1UF 25V X5R 0201" CAP_GRM03 25.099,17.708 r90 top
C308 "CAP CER 12PF 50V C0G/NP0 0402" CAP_GJM15 21.746,30.027 r90 top
C309 "CAP CER 1UF 25V X5R 0402" CAP_GRM15 19.265,24.49 r0 top
C310 "CAP CER 12PF 50V C0G/NP0 0402" CAP_GJM15 23.702,31.754 r180 top
C311 "CAP CER 0.1UF 25V X5R 0201" CAP_GRM03 31.729,16.743 r180 bottom
C312 "CAP CER 1UF 25V X5R 0402" CAP_GRM15 31.881,15.879 r180 bottom
C400 "CAP CER 0.1UF 50V X7R 0402" CAP_GCM/R15 5.287,38.891 r0 top
C404 "CAP CER 10000PF 16V X7R 0402" CAP_GCM/R15 35.539,9.351 r90 bottom
C405 "CAP CER 10000PF 16V X7R 0402" CAP_GCM/R15 42.371,6.684 r180 bottom
C407 "CAP CER 0.1UF 50V X7R 0402" CAP_GCM/R15 6.684,15.625 r90 top
C408 "CAP CER 0.1UF 50V X7R 0402" CAP_GCM/R15 18.173,36.453 r180 bottom
C409 "CAP CER 10UF 10V X7R 0805" CAP_GCM/R21 18.622,35.183 r180 bottom
C410 "CAP CER 1UF 25V X7R 0603" CAP_GCM/R18 11.917,37.85 r315 top
C411 "CAP CER 1UF 25V X7R 0603" CAP_GCM/R18 8.97,38.002 r180 top
C412 "CAP CER 1UF 25V X7R 0603" CAP_GCM/R18 13.593,35.793 r0 top
C413 "CAP CER 1UF 25V X7R 0603" CAP_GCM/R18 12.729,33.659 r270 top
CR300 "CRYSTAL 40.0000MHZ 10PF SMD" CRYST_ECS-400 23.372,29.976 r90 top
D100 "TVS DIODE 3.6VWM 8.4VC 3X2SON" IC_ESD122DMXR 48.315,10.012 r270 bottom
D200 "LED GREEN CLEAR CHIP SMD" LEDM1608X80 9.554,2.417 r180 bottom
D201 "TVS DIODE 7VWM 12VC SMA" DIOM5226X230N 26.725,8.462 r180 bottom
D202 "TVS DIODE 5.5VWM 12.4VC SC703" SOT65P210X110-3N 26.613,2.422 r270 top
D204 "LED GREEN CLEAR CHIP SMD" LEDM1608X80 47.477,52.34 r270 top
D205 "LED GREEN CLEAR CHIP SMD" LEDM1608X80 29.925,41.824 r270 bottom
D206 "LED GREEN CLEAR CHIP SMD" LEDM1608X80 22.915,52.633 r270 top
D207 "LED GREEN CLEAR CHIP SMD" LEDM1608X80 46.435,19.384 r180 top
D208 "LED GREEN CLEAR CHIP SMD" LEDM1608X80 51.033,46.461 r270 bottom
D209 "LED GREEN CLEAR CHIP SMD" LEDM1608X80 2.354,41.762 r180 top
D400 "TVS DIODE 5VWM 10VC 10UDFN" UDFN10_517BB_ONS 39.704,4.855 r90 bottom
D401 "TVS DIODE 5VWM 10VC 10UDFN" UDFN10_517BB_ONS 17.574,34.929 r180 top
D402 "TVS DIODE 5VWM 12.3VC SOD923" "DIOM1006X40N - onsemi" 5.363,19.918 r90 bottom
D403 "TVS DIODE 5VWM 12.3VC SOD923" "DIOM1006X40N - onsemi" 18.114,49.382 r0 bottom
D404 "TVS DIODE 5VWM 12.3VC SOD923" "DIOM1006X40N - onsemi" 13.288,49.356 r180 bottom
ENC400 "ENCODER MECH QUAD RGH ANG PC PIN" EN12-VS_TTE 42.342,10.458 r0 top
FB200 "FERRITE BEAD 120 OHM 0805 1LN" WE-CBF_0805_W4.0 21.416,9.58 r180 bottom
J100 "CONN JACK STEREO 3.5MM R/A" CUI_SJ1-3535NS 44.124,16.895 r180 top
J200 "CONN HEADER SMD R/A 3POS 1.25MM" CONN_505567_03_MOL 2.087,11.917 r270 bottom
J201 "CONN RCPT USB2.0 TYPE C 16+8POS" GCT_USB4085-GF-A_REVA4 26.429,1.972 r180 bottom
J400 "CONN FFC BOTTOM 50POS 0.5MM R/A" AMPHENOL_F32D-1A7Y1-21050 2.258,24 r270 top
J401 "CONN MICROSD CARD R/A SMD" CUI_MSD-1-A 7.191,37.086 r90 bottom
L200 "FIXED IND 6.8UH 4A 74.1 MOHM SMD" IND_SRP4030FA 28.147,51.795 r90 top
L201 "FIXED IND 22UH 300MA 810 MOHM" IND_LQW32FT220M2HL 28.782,52.861 r0 bottom
L202 "FIXED IND 22UH 300MA 810 MOHM" IND_LQW32FT220M2HL 25.175,46.664 r270 bottom
L203 "FIXED IND 1UH 2A 95 MOHM SMD" INDC2012X100N 14.33,9.351 r180 bottom
L204 "FIXED IND 18UH 4.5A 62.5 MOHM" IND_XGL5050 16.565,51.261 r180 top
L300 "FIXED IND 2NH 600MA 120 MOHM SMD" IND_LQP03HQ2N0B02D 20.38,25.404 r180 top
L301 "FIXED IND 24NH 140MA 2.3 OHM SMD" IND_LQP03HQ2N0B02D 23.753,27.969 r270 top
Q400 "MOSFET N-CH 60V 115MA SOT23" SOT-23_MCC 15.422,31.627 r90 top
R100 "RES SMD 499 OHM 0.1% 1/16W 0402" RC_0402_YAG 37.612,37.389 r270 bottom
R101 "RES SMD 499 OHM 0.1% 1/16W 0402" RC_0402_YAG 46.413,37.917 r270 bottom
R102 "RES SMD 499 OHM 0.1% 1/16W 0402" RC_0402_YAG 45.156,38.718 r270 bottom
R103 "RES SMD 499 OHM 0.1% 1/16W 0402" RC_0402_YAG 54.033,39.39 r270 bottom
R104 "RES 22 OHM 1% 1/16W 0402" RC_0402_YAG 36.097,34.954 r90 top
R105 "RES 22 OHM 1% 1/16W 0402" RC_0402_YAG 35.132,34.946 r270 top
R106 "RES SMD 10K OHM 1% 1/16W 0402" RC_0402_YAG 39.323,32.406 r270 top
R107 "RES SMD 10K OHM 1% 1/16W 0402" RC_0402_YAG 34.065,30.179 r180 top
R108 "RES SMD 49.9KOHM 0.1% 1/16W 0402" RC_0402_YAG 47.553,18.216 r0 bottom
R111 "RES SMD 10K OHM 1% 1/16W 0402" RC_0402_YAG 29.697,39.552 r0 bottom
R112 "RES SMD 10K OHM 1% 1/16W 0402" RC_0402_YAG 26.564,38.815 r180 bottom
R113 "RES SMD 10K OHM 1% 1/16W 0402" RC_0402_YAG 23.524,39.958 r315 top
R114 "RES SMD 220 OHM 0.1% 1/16W 0402" RC_0402_YAG 40.695,28.731 r270 bottom
R115 "RES SMD 220 OHM 0.1% 1/16W 0402" RC_0402_YAG 49.108,29.798 r180 bottom
R116 "RES SMD 499 OHM 0.1% 1/16W 0402" RC_0402_YAG 51.083,28.909 r180 bottom
R117 "RES SMD 499 OHM 0.1% 1/16W 0402" RC_0402_YAG 44.022,18.952 r270 bottom
R118 "RES SMD 100K OHM 0.1% 1/16W 0402" RC_0402_YAG 27.563,12.552 r180 bottom
R119 "RES SMD 10K OHM 1% 1/16W 0402" RC_0402_YAG 38.561,13.237 r270 bottom
R120 "RES SMD 681 OHM 0.1% 1/16W 0402" RC_0402_YAG 49.102,30.763 r180 bottom
R121 "RES SMD 499 OHM 0.1% 1/16W 0402" RC_0402_YAG 39.21,30.205 r0 bottom
R122 "RES SMD 681 OHM 0.1% 1/16W 0402" RC_0402_YAG 41.152,30.179 r0 bottom
R123 "RES SMD 499 OHM 0.1% 1/16W 0402" RC_0402_YAG 49.051,35.869 r0 bottom
R124 "RES SMD 681 OHM 0.1% 1/16W 0402" RC_0402_YAG 49.102,32.084 r180 bottom
R125 "RES SMD 4.7 OHM 0.1% 1/16W 0402" RC_0402_YAG 45.597,18.216 r180 bottom
R126 "RES SMD 220 OHM 0.1% 1/16W 0402" RC_0402_YAG 50.194,33.049 r180 bottom
R127 "RES SMD 4.7 OHM 0.1% 1/16W 0402" RC_0402_YAG 49.686,18.267 r0 bottom
R128 "RES SMD 54.9KOHM 0.1% 1/16W 0402" RC_0402_YAG 49.28,17.174 r180 bottom
R129 "RES SMD 10K OHM 1% 1/16W 0402" RC_0402_YAG 51.49,13.034 r180 bottom
R131 "RES SMD 499 OHM 0.1% 1/16W 0402" RC_0402_YAG 41.177,35.107 r180 bottom
R132 "RES SMD 681 OHM 0.1% 1/16W 0402" RC_0402_YAG 41.138,31.373 r0 bottom
R133 "RES SMD 220 OHM 0.1% 1/16W 0402" RC_0402_YAG 40.009,32.338 r0 bottom
R134 "RES SMD 499 OHM 0.1% 1/16W 0402" RC_0402_YAG 51.236,18.927 r270 bottom
R135 "RES SMD 10K OHM 1% 1/16W 0402" RC_0402_YAG 32.821,35.564 r270 bottom
R200 "RES 220K OHM 0.1% 1/16W 0402" RC_0402_YAG 30.56,45.919 r90 top
R201 "RES SMD 309K OHM 0.1% 1/16W 0402" RC_0402_YAG 29.849,45.986 r270 bottom
R202 "RES SMD 274K OHM 0.5% 1/10W 0603" RC_0603_YAG 19.816,4.83 r180 bottom
R203 "RES SMD 54.9KOHM 0.1% 1/16W 0402" RC_0402_YAG 30.154,42.371 r180 top
R204 "RES SMD 100K OHM 0.1% 1/16W 0402" RC_0402_YAG 28.35,46.461 r0 bottom
R205 "RES SMD 100K OHM 0.1% 1/16W 0402" RC_0402_YAG 18.292,3.306 r90 bottom
R206 "RES SMD 1K OHM 0.1% 1/16W 0402" RC_0402_YAG 8.132,1.147 r180 bottom
R207 "RES SMD 49.9KOHM 0.1% 1/16W 0402" RC_0402_YAG 31.06,48.467 r180 top
R208 "RES SMD 10K OHM 1% 1/16W 0402" RC_0402_YAG 13.398,10.291 r0 top
R209 "RES SMD 10K OHM 1% 1/16W 0402" RC_0402_YAG 20.087,1.604 r0 top
R210 "RES SMD 10K OHM 1% 1/16W 0402" RC_0402_YAG 15.092,15.582 r90 top
R211 "RES SMD 10K OHM 1% 1/16W 0402" RC_0402_YAG 22.729,15.117 r0 top
R212 "RES SMD 100K OHM 0.1% 1/16W 0402" RC_0402_YAG 31.551,46.74 r270 top
R213 "RES SMD 15K OHM 0.1% 1/16W 0402" RC_0402_YAG 31.551,44.784 r90 top
R214 "RES 5K OHM 1% 1/16W 0402" RC_0402_YAG 16.311,2.806 r90 bottom
R215 "RES SMD 9.88KOHM 0.5% 1/16W 0402" RC_0402_YAG 10.418,4.771 r90 bottom
R216 "RES SMD 10K OHM 1% 1/16W 0402" RC_0402_YAG 13.669,0.588 r0 top
R217 "RES 270 OHM 1% 1/10W 0603" RC_0603_YAG 17.047,4.017 r180 top
R218 "RES 500 OHM 0.1% 1/10W 0603" RC_0603_YAG 7.573,5.008 r270 bottom
R219 "RES 88.7K OHM 1% 1/16W 0402" RC_0402_YAG 37.672,49.534 r270 bottom
R220 "RES SMD 135K OHM 0.1% 1/10W 0603" RC_0603_YAG 37.596,52.684 r0 bottom
R221 "RES SMD 10K OHM 1% 1/16W 0402" RC_0402_YAG 19.029,0.614 r180 top
R222 "RES 909K OHM 1% 1/16W 0402" RC_0402_YAG 42.727,20.959 r0 top
R223 "RES SMD 10K OHM 1% 1/16W 0402" RC_0402_YAG 33.024,24.32 r90 top
R224 "RES SMD 15K OHM 0.1% 1/16W 0402" RC_0402_YAG 39.653,52.98 r270 bottom
R225 "RES SMD 90.9KOHM 0.1% 1/16W 0402" RC_0402_YAG 37.063,23.397 r90 top
R226 "RES SMD 49.9KOHM 0.1% 1/16W 0402" RC_0402_YAG 36.707,49.534 r90 bottom
R227 "RES 0.5 OHM 1% 1/4W 0805" RC_0805_YAG 20.527,12.12 r90 bottom
R228 "RES SMD 100K OHM 0.1% 1/16W 0402" RC_0402_YAG 40.796,20.959 r0 top
R229 "RES SMD 1K OHM 0.1% 1/16W 0402" RC_0402_YAG 38.841,20.959 r180 top
R230 "RES SMD 15.4KOHM 0.1% 1/16W 0402" RC_0402_YAG 41.177,53.471 r180 bottom
R231 "RES SMD 49.9KOHM 0.1% 1/16W 0402" RC_0402_YAG 37.063,21.094 r90 top
R232 "RES SMD 33.2KOHM 0.1% 1/16W 0402" RC_0402_YAG 45.216,51.972 r90 bottom
R233 "RES SMD 33.2KOHM 0.1% 1/16W 0402" RC_0402_YAG 44.352,23.474 r270 top
R234 "RES SMD 5.1K OHM 0.1% 1/16W 0402" RC_0402_YAG 20.426,3.611 r0 bottom
R235 "RES SMD 5.1K OHM 0.1% 1/16W 0402" RC_0402_YAG 28.909,7.649 r180 top
R236 "RES 172K OHM 0.1% 1/10W 0603" RC_0603_YAG 19.548,39.476 r180 top
R237 "RES SMD 54.9KOHM 0.1% 1/16W 0402" RC_0402_YAG 19.994,45.013 r270 top
R238 "RES SMD 49.9KOHM 0.1% 1/16W 0402" RC_0402_YAG 18.978,43.032 r270 top
R239 "RES SMD 100K OHM 0.1% 1/16W 0402" RC_0402_YAG 19.486,47.299 r180 top
R240 "RES SMD 100K OHM 0.1% 1/16W 0402" RC_0402_YAG 19.283,38.307 r180 top
R241 "RES SMD 100K OHM 0.1% 1/16W 0402" RC_0402_YAG 33.634,51.287 r90 bottom
R242 "RES SMD 10K OHM 1% 1/16W 0402" RC_0402_YAG 34.294,50.525 r180 top
R243 "RES 909K OHM 1% 1/16W 0402" RC_0402_YAG 39.001,53.319 r180 top
R244 "RES SMD 90.9KOHM 0.1% 1/16W 0402" RC_0402_YAG 44.632,50.855 r270 top
R245 "RES SMD 100K OHM 0.1% 1/16W 0402" RC_0402_YAG 40.949,53.319 r180 top
R246 "RES SMD 1K OHM 0.1% 1/16W 0402" RC_0402_YAG 42.955,53.319 r0 top
R247 "RES SMD 49.9KOHM 0.1% 1/16W 0402" RC_0402_YAG 45.394,52.633 r180 top
R248 "RES SMD 33.2KOHM 0.1% 1/16W 0402" RC_0402_YAG 37.596,51.033 r90 top
R249 "RES SMD 1K OHM 0.1% 1/16W 0402" RC_0402_YAG 27.919,43.006 r180 bottom
R250 "RES SMD 1K OHM 0.1% 1/16W 0402" RC_0402_YAG 22.889,50.177 r270 top
R251 "RES SMD 1K OHM 0.1% 1/16W 0402" RC_0402_YAG 45.953,20.578 r180 top
R252 "RES SMD 1K OHM 0.1% 1/16W 0402" RC_0402_YAG 49.871,45.978 r270 bottom
R253 "RES SMD 1K OHM 0.1% 1/16W 0402" RC_0402_YAG 1.884,43.006 r0 top
R300 "RES SMD 10K OHM 1% 1/16W 0402" RC_0402_YAG 20.273,13.695 r180 top
R301 "RES SMD 10K OHM 1% 1/16W 0402" RC_0402_YAG 22.542,19.994 r180 bottom
R302 "RES 1K OHM 1% 1/20W 0201" RC_0201_YAG 30.382,13.745 r0 top
R303 "RES 1M OHM 1% 1/20W 0201" RC_0201_YAG 32.186,22.966 r0 top
R304 "RES 22 OHM 1% 1/20W 0201" RC_0201_YAG 26.826,17.479 r90 top
R305 "RES 22 OHM 1% 1/20W 0201" RC_0201_YAG 27.639,17.479 r90 top
R306 "RES 22 OHM 1% 1/20W 0201" RC_0201_YAG 20.786,19.918 r0 top
R307 "RES 22 OHM 1% 1/20W 0201" RC_0201_YAG 25.81,27.715 r270 top
R308 "RES 22 OHM 1% 1/20W 0201" RC_0201_YAG 30.713,21.746 r0 top
R400 "RES SMD 10K OHM 1% 1/16W 0402" RC_0402_YAG 37.444,9.783 r180 bottom
R401 "RES SMD 10K OHM 1% 1/16W 0402" RC_0402_YAG 4.398,20.883 r270 bottom
R402 "RES SMD 10K OHM 1% 1/16W 0402" RC_0402_YAG 5.948,40.72 r180 top
R403 "RES SMD 10K OHM 1% 1/16W 0402" RC_0402_YAG 7.091,32.872 r270 top
R404 "RES SMD 10K OHM 1% 1/16W 0402" RC_0402_YAG 18.267,50.321 r180 bottom
R405 "RES SMD 10K OHM 1% 1/16W 0402" RC_0402_YAG 37.426,10.723 r180 bottom
R406 "RES SMD 10K OHM 1% 1/16W 0402" RC_0402_YAG 13.118,50.296 r0 bottom
R407 "RES SMD 10K OHM 1% 1/16W 0402" RC_0402_YAG 40.161,3.027 r180 bottom
R408 "RES SMD 10K OHM 1% 1/16W 0402" RC_0402_YAG 42.371,5.643 r0 bottom
R409 "RES SMD 1K OHM 0.1% 1/16W 0402" RC_0402_YAG 6.303,18.749 r270 bottom
R410 "RES SMD 1K OHM 0.1% 1/16W 0402" RC_0402_YAG 18.597,47.959 r90 bottom
R411 "RES SMD 1K OHM 0.1% 1/16W 0402" RC_0402_YAG 13.136,48.416 r0 bottom
R412 "RES SMD 10K OHM 1% 1/16W 0402" RC_0402_YAG 40.441,9.681 r180 bottom
R413 "RES SMD 10K OHM 1% 1/16W 0402" RC_0402_YAG 8.691,18.267 r180 top
R414 "RES SMD 10K OHM 1% 1/16W 0402" RC_0402_YAG 18.343,39.907 r90 bottom
R415 "RES SMD 10K OHM 1% 1/16W 0402" RC_0402_YAG 20.324,29.984 r270 bottom
R416 "RES SMD 10K OHM 1% 1/16W 0402" RC_0402_YAG 17.378,39.899 r90 bottom
R417 "RES SMD 10K OHM 1% 1/16W 0402" RC_0402_YAG 16.387,39.907 r90 bottom
R418 "RES SMD 10K OHM 1% 1/16W 0402" RC_0402_YAG 19.333,29.984 r270 bottom
R419 "RES SMD 10K OHM 1% 1/16W 0402" RC_0402_YAG 18.368,29.984 r270 bottom
R420 "RES SMD 100K OHM 0.1% 1/16W 0402" RC_0402_YAG 9.859,31.881 r90 top
R421 "RES SMD 100K OHM 0.1% 1/16W 0402" RC_0402_YAG 10.824,31.873 r90 top
R422 "RES SMD 10K OHM 1% 1/16W 0402" RC_0402_YAG 8.894,31.881 r90 top
R423 "RES 32.4K OHM 1% 1/16W 0402" RC_0402_YAG 12.577,31.627 r180 top
R424 "RES SMD 100K OHM 0.1% 1/16W 0402" RC_0402_YAG 12.577,30.636 r180 top
R425 "RES SMD 100K OHM 0.1% 1/16W 0402" RC_0402_YAG 17.073,29.265 r180 top
SW300 "SWITCH TACTILE SPST-NO 0.05A 16V" SW_PTS810_SJM_250_SMTR_LFS 21.543,11.459 r180 top
SW301 "SWITCH TACTILE SPST-NO 0.05A 16V" SW_PTS810_SJM_250_SMTR_LFS 31.373,11.586 r0 top
SW400 "SWITCH TACTILE SPST-NO 0.05A 12V" SW_TL1014BF220QG 20.781,52.582 r0 bottom
SW401 "SWITCH TACTILE SPST-NO 0.05A 12V" SW_TL1014BF220QG 2.214,23.423 r90 bottom
SW402 "SWITCH TACTILE SPST-NO 0.05A 12V" SW_TL1014BF220QG 10.824,52.582 r0 bottom
TP100 "TEST_POINT" TEST_POINT 29.849,38.815 r90 top
TP101 "TEST_POINT" TEST_POINT 28.427,38.79 r90 top
TP102 "TEST_POINT" TEST_POINT 29.366,29.57 r90 top
TP200 "TEST_POINT" TEST_POINT 14.787,13.441 r90 top
TP201 "TEST_POINT" TEST_POINT 18.902,10.367 r90 bottom
TP202 "TEST_POINT" TEST_POINT 23.626,16.412 r90 top
TP203 "TEST_POINT" TEST_POINT 8.792,41.939 r90 top
TP204 "TEST_POINT" TEST_POINT 10.545,18.419 r90 bottom
TP205 "TEST_POINT" TEST_POINT 47.858,28.173 r90 top
TP206 "TEST_POINT" TEST_POINT 36.428,46.029 r90 top
TP207 "TEST_POINT" TEST_POINT 42.397,41.863 r90 bottom
TP208 "TEST_POINT" TEST_POINT 27.715,44.911 r90 bottom
TP209 "TEST_POINT" TEST_POINT 22.635,44.886 r90 top
TP210 "TEST_POINT" TEST_POINT 5.922,8.894 r90 bottom
TP211 "TEST_POINT" TEST_POINT 22.635,42.981 r90 top
TP212 "TEST_POINT" TEST_POINT 25.76,42.828 r90 bottom
TP213 "TEST_POINT" TEST_POINT 4.576,47.146 r90 top
TP214 "TEST_POINT" TEST_POINT 4.424,7.294 r90 bottom
TP215 "TEST_POINT" TEST_POINT 8.183,18.419 r90 bottom
TP216 "TEST_POINT" TEST_POINT 51.185,27.538 r90 top
TP217 "TEST_POINT" TEST_POINT 20.248,36.707 r90 top
TP218 "TEST_POINT" TEST_POINT 47.756,48.645 r90 bottom
TP219 "TEST_POINT" TEST_POINT 10.52,17.987 r90 top
TP220 "TEST_POINT" TEST_POINT 36.707,8.081 r90 bottom
TP221 "TEST_POINT" TEST_POINT 18.267,9.351 r90 top
TP222 "TEST_POINT" TEST_POINT 41.279,44.683 r90 top
TP300 "TEST_POINT" TEST_POINT 32.414,14.076 r90 top
TP301 "TEST_POINT" TEST_POINT 17.505,14.888 r90 top
TP302 "TEST_POINT" TEST_POINT 18.8,32.287 r90 top
TP303 "TEST_POINT" TEST_POINT 21.315,33.583 r90 top
TP402 "TEST_POINT" TEST_POINT 38.993,10.52 r90 bottom
TP403 "TEST_POINT" TEST_POINT 8.919,22.635 r90 top
TP404 "TEST_POINT" TEST_POINT 9.478,21.188 r90 top
TP405 "TEST_POINT" TEST_POINT 11.612,20.045 r90 top
TP406 "TEST_POINT" TEST_POINT 13.999,34.523 r90 top
U100 "IC OP AMP 2CH 8-SON" SON50P300X300X80-9N200X120 41.335,38.561 r0 bottom
U101 "IC OP AMP 2CH 8-SON" SON50P300X300X80-9N200X120 50.251,39.374 r0 bottom
U102 "IC OP AMP 2CH 8-SON" SON50P300X300X80-9N200X120 45.267,30.611 r0 bottom
U103 "IC OP AMP 2CH 10-VSON" IC_OPA1622IDRCR 47.681,21.95 r270 bottom
U200 "IC REG BUCK BST ADJ 600MA 10MSOP" SOP50P490X110-10N 28.401,46.435 r270 top
U201 "IC REG CUK ADJ 250MA TSOT23-6" TSOT-23_S6 28.858,48.569 r180 bottom
U202 "IC BATT CHG LI-ION 1CELL 24VQFN" QFN50P400X400X100-25N 14.355,5.897 r90 bottom
U203 "IC REG LIN NEG ADJ 200MA 12-DFN" 05-08-1725_ADI 42.041,51.16 r0 bottom
U204 "IC REG LIN POS ADJ 200MA 10DFN" VREG_LT3042EDD#PBF 39.857,23.118 r0 top
U205 "IC REG BUCK BST ADJ 600MA 10MSOP" SOP50P490X110-10N 16.819,45.267 r270 top
U206 "IC REG LIN POS ADJ 200MA 10DFN" VREG_LT3042EDD#PBF 42.066,51.185 r180 top
U300 "IC FLASH 64MBIT SPI/QUAD 8WSON" SON127P600X500X80-9N 34.218,19.867 r180 bottom
U301 "ESP32-S3" IC_ESP32-S3 25.613,22.722 r0 top
U400 "IC LED DRIVER RGLTR 30MA 16VQFN" VQFN016V3030_ROM 9.529,35.285 r90 top
Y100 "XTAL OSC XO 22.5792MHZ CMOS SMD" OSC_ECS-2520MVLC-225.792-CN-TR 37.635,32.476 r90 top
Y101 "XTAL OSC TCXO 24.5760MHZ HCMOS" XTAL_ASTX-H11-24.576MHZ-T 34.269,32.364 r0 top

## Footprints (in the part's own frame and the unit in brackets; to place one, negate y for a bottom-side part, rotate by r counter-clockwise, add the part's x,y. Pads: shape width x height; smd on the part's side, far side on the other; paste and mask are expansions set on the pad)
05-08-1725_ADI [mm]
  rrect12% 0.7x0.25 smd paste+0 mask+0.05: 1(-1.445,1.125) 2(-1.445,0.675) 3(-1.445,0.225) 4(-1.445,-0.225) 5(-1.445,-0.675) 6(-1.445,-1.125) 7(1.445,-1.125) 8(1.445,-0.675) 9(1.445,-0.225) 10(1.445,0.225) 11(1.445,0.675) 12(1.445,1.125)
  rrect12% 1.65x2.38 smd paste+0 mask+0.05: 13(0,0)
  silkscreen extent -1.68,-1.68 1.68,1.68, body extent -1.55,-1.55 1.55,1.55, height 0.81
AMPHENOL_F32D-1A7Y1-21050 [mm]
  rect 0.25x1.3 smd paste+0 mask+0.05: 1(-12.25,3.08) 2(-11.75,3.08) 3(-11.25,3.08) 4(-10.75,3.08) 5(-10.25,3.08) 6(-9.75,3.08) 7(-9.25,3.08) 8(-8.75,3.08) 9(-8.25,3.08) 10(-7.75,3.08) 11(-7.25,3.08) 12(-6.75,3.08) 13(-6.25,3.08) 14(-5.75,3.08) 15(-5.25,3.08) 16(-4.75,3.08) 17(-4.25,3.08) 18(-3.75,3.08) 19(-3.25,3.08) 20(-2.75,3.08) 21(-2.25,3.08) 22(-1.75,3.08) 23(-1.25,3.08) 24(-0.75,3.08) 25(-0.25,3.08) 26(0.25,3.08) 27(0.75,3.08) 28(1.25,3.08) 29(1.75,3.08) 30(2.25,3.08) 31(2.75,3.08) 32(3.25,3.08) 33(3.75,3.08) 34(4.25,3.08) 35(4.75,3.08) 36(5.25,3.08) 37(5.75,3.08) 38(6.25,3.08) 39(6.75,3.08) 40(7.25,3.08) 41(7.75,3.08) 42(8.25,3.08) 43(8.75,3.08) 44(9.25,3.08) 45(9.75,3.08) 46(10.25,3.08) 47(10.75,3.08) 48(11.25,3.08) 49(11.75,3.08) 50(12.25,3.08)
  rect 1.73x2.8 smd paste+0 mask+0.05: S1(-14.19,0) S2(14.19,0)
  silkscreen extent -14.25,-2.05 14.25,4.75, body extent -14.55,-1.64 14.55,3.68, height 3.15
CAP_298D225X0016M2T [mm]
  rrect12% 0.7x0.61 smd mask+0.05: 1(-0.67,0) 2(0.67,0)
  silkscreen extent -1.15,-0.55 1.15,0.55, body extent -0.8,-0.43 0.8,0.43, height 0.9
CAP_GCM/R15 [mm]
  rrect12% 0.5x0.6 smd mask+0.05: 1(-0.5,0) 2(0.5,0)
  silkscreen extent -0.91,-0.45 0.91,0.45, body extent -0.5,-0.25 0.5,0.25, height 0.6
CAP_GCM/R18 [mm]
  rrect12% 0.725x0.9 smd mask+0.05: 1(0.763,0) 2(-0.763,0)
  silkscreen extent -1.31,-0.61 1.31,0.61, body extent -0.8,-0.4 0.8,0.4, height 1
CAP_GCM/R21 [mm]
  rrect12% 0.7x1.3 smd mask+0.05: 1(-0.95,0) 2(0.95,0)
  silkscreen extent -1.45,-0.77 1.45,0.78, body extent -1,-0.63 1,0.63, height 1.4
CAP_GCM/R32 [mm]
  rrect12% 1.1x2.05 smd mask+0.05: 1(-1.341,0) 2(1.341,0)
  silkscreen extent -2.1,-1.25 2.1,1.25, body extent -1.6,-1.25 1.6,1.25, height 2.65
CAP_GJM15 [mm]
  rrect12% 0.4x0.5 smd mask+0.05: 1(-0.4,0) 2(0.4,0)
  silkscreen extent -0.75,-0.4 0.75,0.4, body extent -0.5,-0.25 0.5,0.25, height 0.55
CAP_GRM03 [mm]
  rrect12% 0.3x0.35 smd mask+0.05: 1(-0.275,0) 2(0.275,0)
  silkscreen extent -0.55,-0.3 0.55,0.3, body extent -0.31,-0.15 0.31,0.15, height 0.33
CAP_GRM15 [mm]
  rrect12% 0.45x0.6 smd mask+0.05: 1(-0.5,0) 2(0.5,0)
  silkscreen extent -0.91,-0.45 0.91,0.45, body extent -0.5,-0.25 0.5,0.25, height 0.6
CAP_GRM18 [mm]
  rrect12% 0.75x0.9 smd mask+0.05: 1(0.775,0) 2(-0.775,0)
  silkscreen extent -1.31,-0.61 1.31,0.61, body extent -0.8,-0.4 0.8,0.4, height 1
"CAPC2012X140N - CUT" [mm]
  rrect12% 1x0.45 smd mask+0.05: 1(-1.1,0.33) 2(-1.1,-0.33) 3(1.1,0.33) 4(1.1,-0.33)
  silkscreen extent -1.75,-0.75 1.75,0.75, body extent -1,-0.63 1,0.63, height 1.4
CONN_505567_03_MOL [mil]
  rect 33x51 smd paste+0 mask+4.02: 1(49.21,-69.07) 2(0,-69.07) 3(-49.21,-69.07)
  rect 55x89 smd paste+0 mask+4.02: 4(-124.02,21.28) 5(124.02,21.28)
  silkscreen extent -143,-87 143,88, body extent -138,-83 138,82, height 153
CRYST_ECS-400 [mm]
  rrect12% 0.85x0.75 smd mask+0.05: 1(-0.675,0.525) 2(0.675,0.525) 3(0.675,-0.525) 4(-0.675,-0.525)
  silkscreen extent -1.25,-1.1 1.25,1.1, body extent -1,-0.8 1,0.8, height 0.5
CUI_MSD-1-A [mm]
  rect 0.7x1.6 smd mask+0.102: 1(2.25,7.75) 2(1.15,7.75) 3(0.05,7.75) 4(-1.05,7.75) 5(-2.15,7.75) 6(-3.25,7.75) 7(-4.35,7.75) 8(-5.45,7.75) CD(-6.55,7.75)
  rect 1.2x1.8 smd mask+0.102: G1(-7.75,6.45)
  rect 1.6x1.5 smd mask+0.102: G2(6.85,6.7)
  rect 1.2x2.2 smd mask+0.102: G3(-7.75,-2.85) G4(7.75,-2.85)
  round 1 hole 1 unplated: ""(-4.95,-3.25) ""(3.05,-3.25)
  silkscreen extent -7.42,-7.25 7.42,7.25, body extent -8.12,-7.32 8.03,7.73, height 1.85
CUI_SJ1-3535NS [mm]
  oval 1.4x2.8 hole 1 slot 2 at 90 deg: 1(-9.144,4.064) 2(-6.744,6.064) 3(-1.244,6.064) 4(2.456,4.064) 5(-3.044,4.064)
  oval 2.8x1.4 hole 1 slot 2 at 0 deg: SH1(-8.144,-0.236) SH2(0.756,-0.236) SH3(0.756,8.464)
  silkscreen extent -10.64,-0.74 4.06,9.91, body extent -14.26,-0.68 4.1,9.02, height 12.65
"DIOM1006X40N - onsemi" [mm]
  rect 0.36x0.25 smd mask+0.05: A(0.42,0) C(-0.42,0)
  silkscreen extent -0.74,-0.38 0.74,0.38, body extent -0.5,-0.3 0.5,0.3, height 0.4
DIOM5226X230N [mm]
  rrect25% 2.33x1.55 smd: A(-2.135,0) C(2.135,0)
  silkscreen extent -4.4,-1.3 2.15,1.3, body extent -2.6,-1.3 2.6,1.3, height 2.4
EN12-VS_TTE [mm]
  round 1.5 hole 1 paste-2539.97 mask+0: 1(-5,-8.738) 2(-2.5,-8.738) 3(0,-8.738) 4(-5,-6.238) 5(0,-6.238)
  rrect50% 4x4 hole 3 paste-2539.97 mask-1.003: 6(3.901,-5.239) 7(-8.901,-5.239)
  body extent -8.77,-22.9 3.81,-2.9, height 16.58
GCT_USB4085-GF-A_REVA4 [mm]
  round 0.65 hole 0.4: A1(-2.975,4.36) A4(-2.125,4.36) A5(-1.275,4.36) A6(-0.425,4.36) A7(0.425,4.36) A8(1.275,4.36) A9(2.125,4.36) A12(2.975,4.36) B1(2.975,3.01) B4(2.125,3.01) B5(1.275,3.01) B6(0.425,3.01) B7(-0.425,3.01) B8(-1.275,3.01) B9(-2.125,3.01) B12(-2.975,3.01)
  oval 0.9x1.7 hole 0.6 slot 1.4 at 90 deg: S1(-4.325,0) S2(4.325,0)
  oval 0.9x2.4 hole 0.6 slot 2.1 at 90 deg: S3(-4.325,3.38) S4(4.325,3.38)
  silkscreen extent -4.47,-1.74 4.47,1.85, body extent -4.47,-4.25 4.47,4.92, height 3.46
IC_ESD122DMXR [mm]
  rrect50% 0.2x0.2 smd paste+0 mask+0.05: 1(-0.15,0) 2(0.15,-0.34) 3(0.15,0.34)
  silkscreen extent -0.75,-0.55 0.35,0.55, body extent -0.3,-0.5 0.3,0.5, height 0.4
IC_ESP32-S3 [mm]
  rect 0.65x0.22 smd mask+0.05: 1(-3.425,2.6) 2(-3.425,2.2) 3(-3.425,1.8) 4(-3.425,1.4) 5(-3.425,1) 6(-3.425,0.6) 7(-3.425,0.2) 8(-3.425,-0.2) 9(-3.425,-0.6) 10(-3.425,-1) 11(-3.425,-1.4) 12(-3.425,-1.8) 13(-3.425,-2.2) 14(-3.425,-2.6) 29(3.425,-2.6) 30(3.425,-2.2) 31(3.425,-1.8) 32(3.425,-1.4) 33(3.425,-1) 34(3.425,-0.6) 35(3.425,-0.2) 36(3.425,0.2) 37(3.425,0.6) 38(3.425,1) 39(3.425,1.4) 40(3.425,1.8) 41(3.425,2.2) 42(3.425,2.6)
  rect 0.22x0.65 smd mask+0.05: 15(-2.6,-3.425) 16(-2.2,-3.425) 17(-1.8,-3.425) 18(-1.4,-3.425) 19(-1,-3.425) 20(-0.6,-3.425) 21(-0.2,-3.425) 22(0.2,-3.425) 23(0.6,-3.425) 24(1,-3.425) 25(1.4,-3.425) 26(1.8,-3.425) 27(2.2,-3.425) 28(2.6,-3.425) 43(2.6,3.425) 44(2.2,3.425) 45(1.8,3.425) 46(1.4,3.425) 47(1,3.425) 48(0.6,3.425) 49(0.2,3.425) 50(-0.2,3.425) 51(-0.6,3.425) 52(-1,3.425) 53(-1.4,3.425) 54(-1.8,3.425) 55(-2.2,3.425) 56(-2.6,3.425)
  round 0.7 hole 0.4 mask+0: 57(-1.5,-0.75) 57(-1.5,0.75) 57(-0.75,-1.5) 57(-0.75,0) 57(-0.75,1.5) 57(0,-0.75) 57(0,0.75) 57(0.75,-1.5) 57(0.75,0) 57(0.75,1.5) 57(1.5,-0.75) 57(1.5,0.75)
  rect 4.1x4.1 smd paste-1.55: 57(0,0)
  silkscreen extent -3.5,-3.5 3.5,3.5, body extent -3.5,-3.5 3.5,3.5, height 0.9
IC_OPA1622IDRCR [mm]
  rrect25% 0.6x0.24 smd mask+0.07: 1(-1.4,1) 2(-1.4,0.5) 3(-1.4,0) 4(-1.4,-0.5) 5(-1.4,-1) 6(1.4,-1) 7(1.4,-0.5) 8(1.4,0) 9(1.4,0.5) 10(1.4,1)
  round 0.3 hole 0.2 mask+0: 11(-0.575,0) 11(0,-0.95) 11(0,0.95) 11(0.575,0)
  round 0.025 smd paste+0 mask+0.07: 11(0,0)
  L1 (SIG/PWR) region: 0.375,1.2 0.825,1.2 0.825,-1.2 0.375,-1.2 0.375,-1.7 0.125,-1.7 0.125,-1.2 -0.125,-1.2 -0.125,-1.7 -0.375,-1.7 -0.375,-1.2 -0.825,-1.2 -0.825,1.2 -0.375,1.2 -0.375,1.7 -0.125,1.7 -0.125,1.2 0.125,1.2 0.125,1.7 0.375,1.7
  silkscreen extent -1.5,-1.5 1.5,1.5, body extent -1.5,-1.5 1.5,1.5, height 1
IND_LQP03HQ2N0B02D [mm]
  rect 0.3x0.275 smd mask+0.05: 1(-0.3,0) 2(0.3,0)
  silkscreen extent -0.6,-0.28 0.6,0.28, body extent -0.3,-0.15 0.3,0.15, height 0.42
IND_LQW32FT220M2HL [mm]
  rrect12% 0.9x2.5 smd mask+0.05: 1(-1.55,0) 2(1.55,0)
  silkscreen extent -2.28,-1.48 2.28,1.48
IND_SRP4030FA [mm]
  rect 3.8x1.1 smd paste+0 mask+0.1: 1(0,-1.25) 2(0,1.25)
  silkscreen extent -2.25,-2.25 2.25,2.25, body extent -2.05,-2.05 2.05,2.05, height 2.86
IND_XGL5050 [mm]
  rrect12% 1.18x4.7 smd mask+0.05: 1(-1.655,0) 2(1.655,0)
  silkscreen extent -2.75,-2.88 2.75,2.88, body extent -2.74,-2.84 2.74,2.84, height 5.15
INDC2012X100N [mm]
  rect 0.8x1.4 smd: 1(-0.8,0) 2(0.8,0)
  body extent -1,-0.6 1,0.6, height 1
LEDM1608X80 [mm]
  rect 0.8x0.8 smd: A(0.75,0) C(-0.75,0)
  silkscreen extent -1.37,-0.58 1.37,0.61, body extent -0.8,-0.4 0.8,0.4, height 0.8
OSC_ECS-2520MVLC-225.792-CN-TR [mm]
  rect 0.9x0.8 smd mask+0.05: 1(-0.925,-0.725) 2(0.925,-0.725) 3(0.925,0.725) 4(-0.925,0.725)
  silkscreen extent -0.22,-1 0.22,1, body extent -1.25,-1 1.25,1, height 0.9
QFN40P300X500X80-31N-D [mm]
  rrect12% 0.75x0.2 smd mask+0.05: 1(-1.5,1.8) 2(-1.5,1.4) 3(-1.5,1) 4(-1.5,0.6) 5(-1.5,0.2) 6(-1.5,-0.2) 7(-1.5,-0.6) 8(-1.5,-1) 9(-1.5,-1.4) 10(-1.5,-1.8) 16(1.5,-1.8) 17(1.5,-1.4) 18(1.5,-1) 19(1.5,-0.6) 20(1.5,-0.2) 21(1.5,0.2) 22(1.5,0.6) 23(1.5,1) 24(1.5,1.4) 25(1.5,1.8)
  rrect12% 0.2x0.75 smd mask+0.05: 11(-0.8,-2.5) 12(-0.4,-2.5) 13(0,-2.5) 14(0.4,-2.5) 15(0.8,-2.5) 26(0.8,2.5) 27(0.4,2.5) 28(0,2.5) 29(-0.4,2.5) 30(-0.8,2.5)
  rrect12% 1.8x3.8 smd mask+0.05: 31(0,0)
  silkscreen extent -1.97,2.3 -1.78,2.5, body extent -1.55,-2.55 1.55,2.55, height 0.8
QFN50P400X400X100-25N [mm]
  rrect40% 0.58x0.24 smd mask+0.07: 1(-1.935,1.25) 2(-1.935,0.75) 3(-1.935,0.25) 4(-1.935,-0.25) 5(-1.935,-0.75) 6(-1.935,-1.25) 13(1.935,-1.25) 14(1.935,-0.75) 15(1.935,-0.25) 16(1.935,0.25) 17(1.935,0.75) 18(1.935,1.25)
  rrect40% 0.24x0.58 smd mask+0.07: 7(-1.25,-1.935) 8(-0.75,-1.935) 9(-0.25,-1.935) 10(0.25,-1.935) 11(0.75,-1.935) 12(1.25,-1.935) 19(1.25,1.935) 20(0.75,1.935) 21(0.25,1.935) 22(-0.25,1.935) 23(-0.75,1.935) 24(-1.25,1.935)
  rrect3% 2.7x2.7 smd paste-0.45 mask+0.07: 25(0,0)
  silkscreen extent -3.07,-2 2,2, body extent -2,-2 2,2, height 1
RC_0201_YAG [mm]
  rrect12% 0.35x0.4 smd mask+0.05: 1(0.325,0) 2(-0.325,0)
  silkscreen extent -0.65,-0.35 0.65,0.35, body extent -0.3,-0.15 0.3,0.15, height 0.26
RC_0402_YAG [mm]
  rrect12% 0.5x0.6 smd mask+0.05: 1(-0.5,0) 2(0.5,0)
  silkscreen extent -0.9,-0.43 0.9,0.43, body extent -0.5,-0.25 0.5,0.25, height 0.4
RC_0603_YAG [mm]
  rrect12% 0.9x0.8 smd mask+0.05: 1(0.85,0) 2(-0.85,0)
  silkscreen extent -1.43,-0.5 1.43,0.5, body extent -0.8,-0.4 0.8,0.4, height 0.55
RC_0805_YAG [mm]
  rrect12% 0.9x1.2 smd mask+0.05: 1(1.05,0) 2(-1.05,0)
  silkscreen extent -1.65,-0.77 1.65,0.78, body extent -1,-0.63 1,0.63, height 0.65
SON50P300X300X80-9N200X120 [mm]
  rrect40% 0.7x0.25 smd mask+0.07: 1(-1.35,0.75) 2(-1.35,0.25) 3(-1.35,-0.25) 4(-1.35,-0.75) 5(1.35,-0.75) 6(1.35,-0.25) 7(1.35,0.25) 8(1.35,0.75)
  round 0.5 hole 0.25 mask+0: 9(-0.35,0) 9(0.008,-0.663) 9(0.35,0)
  rrect8% 1.2x2 smd paste+0 mask+0.07: 9(0,0)
  silkscreen extent -1.55,-1.55 1.55,1.55, body extent -1.5,-1.5 1.5,1.5, height 0.8
SON127P600X500X80-9N [mm]
  rrect12% 1x0.4 smd mask+0.05: 1(-3,-1.905) 2(-3,-0.635) 3(-3,0.635) 4(-3,1.905) 5(3,1.905) 6(3,0.635) 7(3,-0.635) 8(3,-1.905)
  rrect12% 3.5x4 smd mask+0.05: 9(0,0)
SOP50P490X110-10N [mm]
  rect 0.889x0.305 smd paste+0 mask+0.05: 1(-2.107,1) 2(-2.107,0.5) 3(-2.107,0) 4(-2.107,-0.5) 5(-2.107,-1) 6(2.107,-1) 7(2.107,-0.5) 8(2.107,0) 9(2.107,0.5) 10(2.107,1)
  silkscreen extent -1.5,-1.5 1.5,1.5, body extent -2.45,-1.5 2.45,1.5, height 1.1
SOT65P210X110-3N [mm]
  rrect25% 1.19x0.4 smd paste+0 mask+0.102: 1(-0.96,0.65) 2(-0.96,-0.65) 3(0.96,0)
  silkscreen extent -1.81,-1.25 1.81,1.25, body extent -1.05,-1 1.05,1, height 1.1
SOT-23_MCC [mm]
  rrect12% 0.8x0.9 smd paste+0 mask+0.102: 1(-0.95,-1) 2(0.95,-1) 3(0,1)
  silkscreen extent -1.75,-1.75 1.75,1.75, body extent -1.46,-1.18 1.46,1.18, height 1.22
SW_PTS810_SJM_250_SMTR_LFS [mm]
  rect 1.05x0.65 smd mask+0.05: 1(-2.075,1.075) 2(2.075,1.075) 3(-2.075,-1.075) 4(2.075,-1.075)
  silkscreen extent -3.2,-1.62 2.1,1.62, body extent -2.3,-1.6 2.3,1.6, height 2.7
SW_TL1014BF220QG [mm]
  rect 1.2x1 smd mask+0.05: 1(2.8,0.85) 2(2.8,-0.85) 3(-2.8,0.85) 4(-2.8,-0.85)
  body extent -3.2,-2.75 3.2,1.75, height 1.65
TEST_POINT [mm]
  round 1 smd mask+0.05: 1(0,0)
TSOT-23_S6 [mm]
  rrect12% 1.22x0.62 smd paste+0 mask+0.05: 1(-1.31,0.95) 2(-1.31,0) 3(-1.31,-0.95) 4(1.31,-0.95) 5(1.31,0) 6(1.31,0.95)
  body extent -1.4,-1.45 1.4,1.45, height 1
UDFN10_517BB_ONS [mm]
  rect 0.5x0.25 smd paste+0 mask+0.05: 1(-0.4,1) 2(-0.4,0.5) 4(-0.4,-0.5) 5(-0.4,-1) 6(0.4,-1) 7(0.4,-0.5) 9(0.4,0.5) 10(0.4,1)
  rect 0.5x0.45 smd paste+0 mask+0.05: 3(-0.4,0) 8(0.4,0)
  silkscreen extent -1.14,-1.35 0.85,1.35, body extent -0.5,-1.25 0.5,1.25, height 0.55
VQFN016V3030_ROM [mil]
  rrect12% 28x9.84 smd paste+0 mask+1.97: 1(-57,30) 2(-57,10) 3(-57,-10) 4(-57,-30) 9(57,-30) 10(57,-10) 11(57,10) 12(57,30)
  rrect12% 9.84x28 smd paste+0 mask+1.97: 5(-30,-57) 6(-10,-57) 7(10,-57) 8(30,-57) 13(30,57) 14(10,57) 15(-10,57) 16(-30,57)
  rrect12% 55.12x55.12 smd paste+0 mask+1.97: 17(0,0)
  silkscreen extent -64,-64 64,64, body extent -59,-59 59,59, height 39
VREG_LT3042EDD#PBF [mm]
  rrect12% 0.7x0.25 smd mask+0.05: 1(-1.425,1) 2(-1.425,0.5) 3(-1.425,0) 4(-1.425,-0.5) 5(-1.425,-1) 6(1.425,-1) 7(1.425,-0.5) 8(1.425,0) 9(1.425,0.5) 10(1.425,1)
  rrect12% 1.65x2.38 smd paste-2 mask+0.05: 11(0,0)
  silkscreen extent -1.5,-1.5 1.5,1.5, body extent -1.5,-1.5 1.5,1.5, height 0.8
WE-CBF_0805_W4.0 [mm]
  rrect12% 0.9x1 smd paste+0 mask+0.05: 1(-1.05,0) 2(1.05,0)
  silkscreen extent -1.6,-0.65 1.6,0.65, body extent -1,-0.6 1,0.6, height 0.95
XTAL_ASTX-H11-24.576MHZ-T [mm]
  rect 1.3x1.1 smd mask+0.05: 1(-1.15,-0.95) 2(1.15,-0.95) 3(1.15,0.95) 4(-1.15,0.95)
  silkscreen extent -1.63,-1.27 1.63,1.27, body extent -1.6,-1.25 1.6,1.25, height 1.01

## Part data
B100: library part #1-053, Manufacturer 1="ESS Technology", Manufacturer Part Number 1=ES9038Q2M, Mouser Part Number=460-ES9038Q2M, <Termination>=SMD, AL-PN=#1-053, Creator Project=DAP, Footprint Status=Verified, Geometry.Height=0.8mm, Lead Time="9 Weeks", Manufacturer_Name="ESS Technology", Manufacturer_Part_Number=ES9038Q2M, Mouser Price/Stock=https://www.mouser.co.uk/ProductDetail/ESS-Technology/ES9038Q2M?qs=sPbYRqrBIVmdeUedURuuOw%3D%3D, PartType=IC, Status=Unverified, SubType=DAC, Supplier 1=Mouser, Supplier Label="Audio D/A Converter ICs Sabre 32 Reference Stereo low power audiophile DAC w/DOP", Supplier Part Number 1=460-ES9038Q2M, Type=Standard
C100 C101 C106 C107 C124 C138: library part #1-106, <Rating>=50V, <Tolerance>=0.01, <Value>=1.5nF, Manufacturer 1="Murata Electronics", Manufacturer Part Number 1=GCM1885C1H152FA16D, Supplier Part Number 1=490-18206-1-ND, <Footprint>=0603, <Spec>=C0G, <Termination>=SMD, AL-PN=#1-106, Creator Project=DAP, Footprint Status=Verified, Lead Time="21 Weeks", PartType=Capacitor, Status=Unverified, SubType=Ceramic, Supplier 1=Digikey, Supplier Label="1500 pF ±1% 50V Ceramic Capacitor C0G, NP0 0603 (1608 Metric)", Type=Standard
C102 C105 C113 C115 C119 C121 C122 C301 C305 C309 C312: library part #1-153, <Rating>=25V, <Tolerance>=0.1, <Value>=1uF, Manufacturer 1="Murata Electronics", Manufacturer Part Number 1=GRT155R61E105KE01D, Supplier Part Number 1=490-12263-1-ND, <Footprint>=0402, <Spec>=X5R, <Termination>=SMD, AL-PN=#1-153, Creator Project=DAP, Footprint Status=Verified, Lead Time="21 Weeks", PartType=Capacitor, Status=Unverified, SubType=Ceramic, Supplier 1=Digikey, Supplier Label="1 µF ±10% 25V Ceramic Capacitor X5R 0402 (1005 Metric)", Type=Standard
C103 C104 C112 C114 C116 C120 C139 C302 C303 C306 C307 C311: library part #1-144, <Rating>=25V, <Tolerance>=0.1, <Value>=0.1uF, Manufacturer 1="Murata Electronics", Manufacturer Part Number 1=GRM033R61E104KE14D, Supplier Part Number 1=490-12686-1-ND, <Footprint>=0201, <Spec>=X5R, <Termination>=SMD, AL-PN=#1-144, Creator Project=DAP, Footprint Status=Verified, Lead Time="17 Weeks", PartType=Capacitor, Status=Unverified, SubType=Ceramic, Supplier 1=Digikey, Supplier Label="0.1 µF ±10% 25V Ceramic Capacitor X5R 0201 (0603 Metric)", Type=Standard
C108 C109 C110 C111 C125 C126 C128 C133 C134 C213 C230 C234 C400 C407 C408: library part #1-080, <Rating>=50V, <Tolerance>=0.1, <Value>=0.1uF, Manufacturer 1="Murata Electronics", Manufacturer Part Number 1=GCM155R71H104KE02D, Supplier Part Number 1=490-10672-1-ND, <Footprint>=0402, <Spec>=X7R, <Termination>=SMD, AL-PN=#1-080, Creator Project=DAP, Footprint Status=Verified, Lead Time="21 Weeks", PartType=Capacitor, Status=Unverified, SubType=Ceramic, Supplier 1=Digikey, Supplier Label="0.1 µF ±10% 50V Ceramic Capacitor X7R 0402 (1005 Metric)", Type=Standard
C117: library part #1-103, <Rating>=6.3V, <Tolerance>=0.2, <Value>=4.7uF, Manufacturer 1="Murata Electronics", Manufacturer Part Number 1=GRM155R60J475ME47D, Supplier Part Number 1=490-5915-1-ND, <Footprint>=0402, <Termination>=SMD, AL-PN=#1-103, Creator Project=DAP, Footprint Status=Verified, Lead Time="17 Weeks", PartType=Capacitor, Status=Unverified, SubType=Ceramic, Supplier 1=Digikey, Supplier Label="4.7 µF ±20% 6.3V Ceramic Capacitor X5R 0402 (1005 Metric)", Type=Standard
C118 C123 C132 C137: library part #1-107, <Rating>=50V, <Tolerance>=0.02, <Value>=2.7nF, Manufacturer 1="Murata Electronics", Manufacturer Part Number 1=GRM1555C1H272GE01D, Supplier Part Number 1=490-GRM1555C1H272GE01DCT-ND, <Footprint>=0402, <Spec>=C0G, <Termination>=SMD, AL-PN=#1-107, Creator Project=DAP, Footprint Status=Verified, Lead Time="17 Weeks", PartType=Capacitor, Status=Unverified, SubType=Ceramic, Supplier 1=Digikey, Supplier Label="2700 pF ±2% 50V Ceramic Capacitor C0G, NP0 0402 (1005 Metric)", Type=Standard
C127 C130 C131 C136: library part #1-108, <Rating>=50V, <Tolerance>=0.05, <Value>=13nF, Manufacturer 1="Murata Electronics", Manufacturer Part Number 1=GRM2195C1H133JA01D, Supplier Part Number 1=490-12752-1-ND, <Footprint>=0805, <Spec>=C0G, <Termination>=SMD, AL-PN=#1-108, Creator Project=DAP, Footprint Status=Verified, Lead Time="17 Weeks", PartType=Capacitor, Status=Unverified, SubType=Ceramic, Supplier 1=Digikey, Supplier Label="0.013 µF ±5% 50V Ceramic Capacitor C0G, NP0 0805 (2012 Metric)", Type=Standard
C129 C135 C200 C215 C410 C411 C412 C413: library part #1-132, <Rating>=25V, <Tolerance>=0.1, <Value>=1uF, Manufacturer 1="Murata Electronics", Manufacturer Part Number 1=GCM188R71E105KA64D, Supplier Part Number 1=490-10673-1-ND, <Footprint>=0603, <Spec>=X7R, <Termination>=SMD, AL-PN=#1-132, Creator Project=DAP, Footprint Status=Verified, Lead Time="21 Weeks", PartType=Capacitor, Status=Unverified, SubType=Ceramic, Supplier 1=Digikey, Supplier Label="1 µF ±10% 25V Ceramic Capacitor X7R 0603 (1608 Metric)", Type=Standard
C201 C202: library part #1-070, <Rating>=25V, <Tolerance>=0.1, <Value>=2.2uF, Manufacturer 1="Murata Electronics", Manufacturer Part Number 1=GRM188Z71E225KE43D, Supplier Part Number 1=490-GRM188Z71E225KE43DCT-ND, <Footprint>=0603, <Spec>=X7R, <Termination>=SMD, AL-PN=#1-070, Creator Project=DAP, Footprint Status=Verified, Lead Time="17 Weeks", PartType=Capacitor, Status=Unverified, SubType=Ceramic, Supplier 1=Digikey, Supplier Label="2.2 µF ±10% 25V Ceramic Capacitor X7R 0603 (1608 Metric)", Type=Standard
C203 C206 C211 C218 C220 C224 C232 C304 C409: library part #1-081, <Rating>=10V, <Tolerance>=0.1, <Value>=10uF, Manufacturer 1="Murata Electronics", Manufacturer Part Number 1=GCM21BR71A106KE22K, Supplier Part Number 1=490-14531-1-ND, <Footprint>=0805, <Spec>=X7R, <Termination>=SMD, AL-PN=#1-081, Creator Project=DAP, Footprint Status=Verified, Lead Time="21 Weeks", PartType=Capacitor, Status=Unverified, SubType=Ceramic, Supplier 1=Digikey, Supplier Label="10 µF ±10% 10V Ceramic Capacitor X7R 0805 (2012 Metric)", Type=Standard
C204 C208 C209 C227 C228 C229: library part #1-073, <Rating>=25V, <Tolerance>=0.1, <Value>=22uF, Manufacturer 1="Murata Electronics", Manufacturer Part Number 1=GCM32EC71E226KE36L, Supplier Part Number 1=490-GCM32EC71E226KE36LCT-ND, <Footprint>=1210, <Spec>=X7S, <Termination>=SMD, AL-PN=#1-073, Creator Project=DAP, Footprint Status=Verified, Lead Time="21 Weeks", PartType=Capacitor, Status=Unverified, SubType=Ceramic, Supplier 1=Digikey, Supplier Label="22 µF ±10% 25V Ceramic Capacitor X7S 1210 (3225 Metric)", Type=Standard
C205: library part #1-093, <Rating>=50V, <Tolerance>=0.05, <Value>=22pF, Manufacturer 1="Murata Electronics", Manufacturer Part Number 1=GRM1555C1H220JA01D, Supplier Part Number 1=490-5868-1-ND, <Footprint>=0402, <Spec>=C0G, <Termination>=SMD, AL-PN=#1-093, Creator Project=DAP, Footprint Status=Verified, Lead Time="17 Weeks", PartType=Capacitor, Status=Unverified, SubType=Ceramic, Supplier 1=Digikey, Supplier Label="22 pF ±5% 50V Ceramic Capacitor C0G, NP0 0402 (1005 Metric)", Type=Standard
C207: library part #1-059, <Rating>=16V, <Tolerance>=0.1, <Value>=33nF, Manufacturer 1="Murata Electronics", Manufacturer Part Number 1=GRM155R71C333KA01D, Supplier Part Number 1=490-3257-1-ND, <Footprint>=0402, <Spec>=X7R, <Termination>=SMD, AL-PN=#1-059, Creator Project=DAP, Footprint Status=Verified, Lead Time="17 Weeks", PartType=Capacitor, Status=Unverified, SubType=Ceramic, Supplier 1=Digikey, Supplier Label="0.033 µF ±10% 16V Ceramic Capacitor X7R 0402 (1005 Metric)", Type=Standard